# Altium PCB ELF 2 & ELF 2_Lite V1.3.PcbDoc (part 1 of 8)
Units mm, origin at the board's own origin, x right, y up, seen from the top; angles counter-clockwise.
Board outline 120 x 75 mm, 4 copper layers (01 TOP, 02 GND, 03 Signal, 04 BOT), stack 0.603 mm thick; 470 components, 412 nets, 2075 pads, 1565 vias.
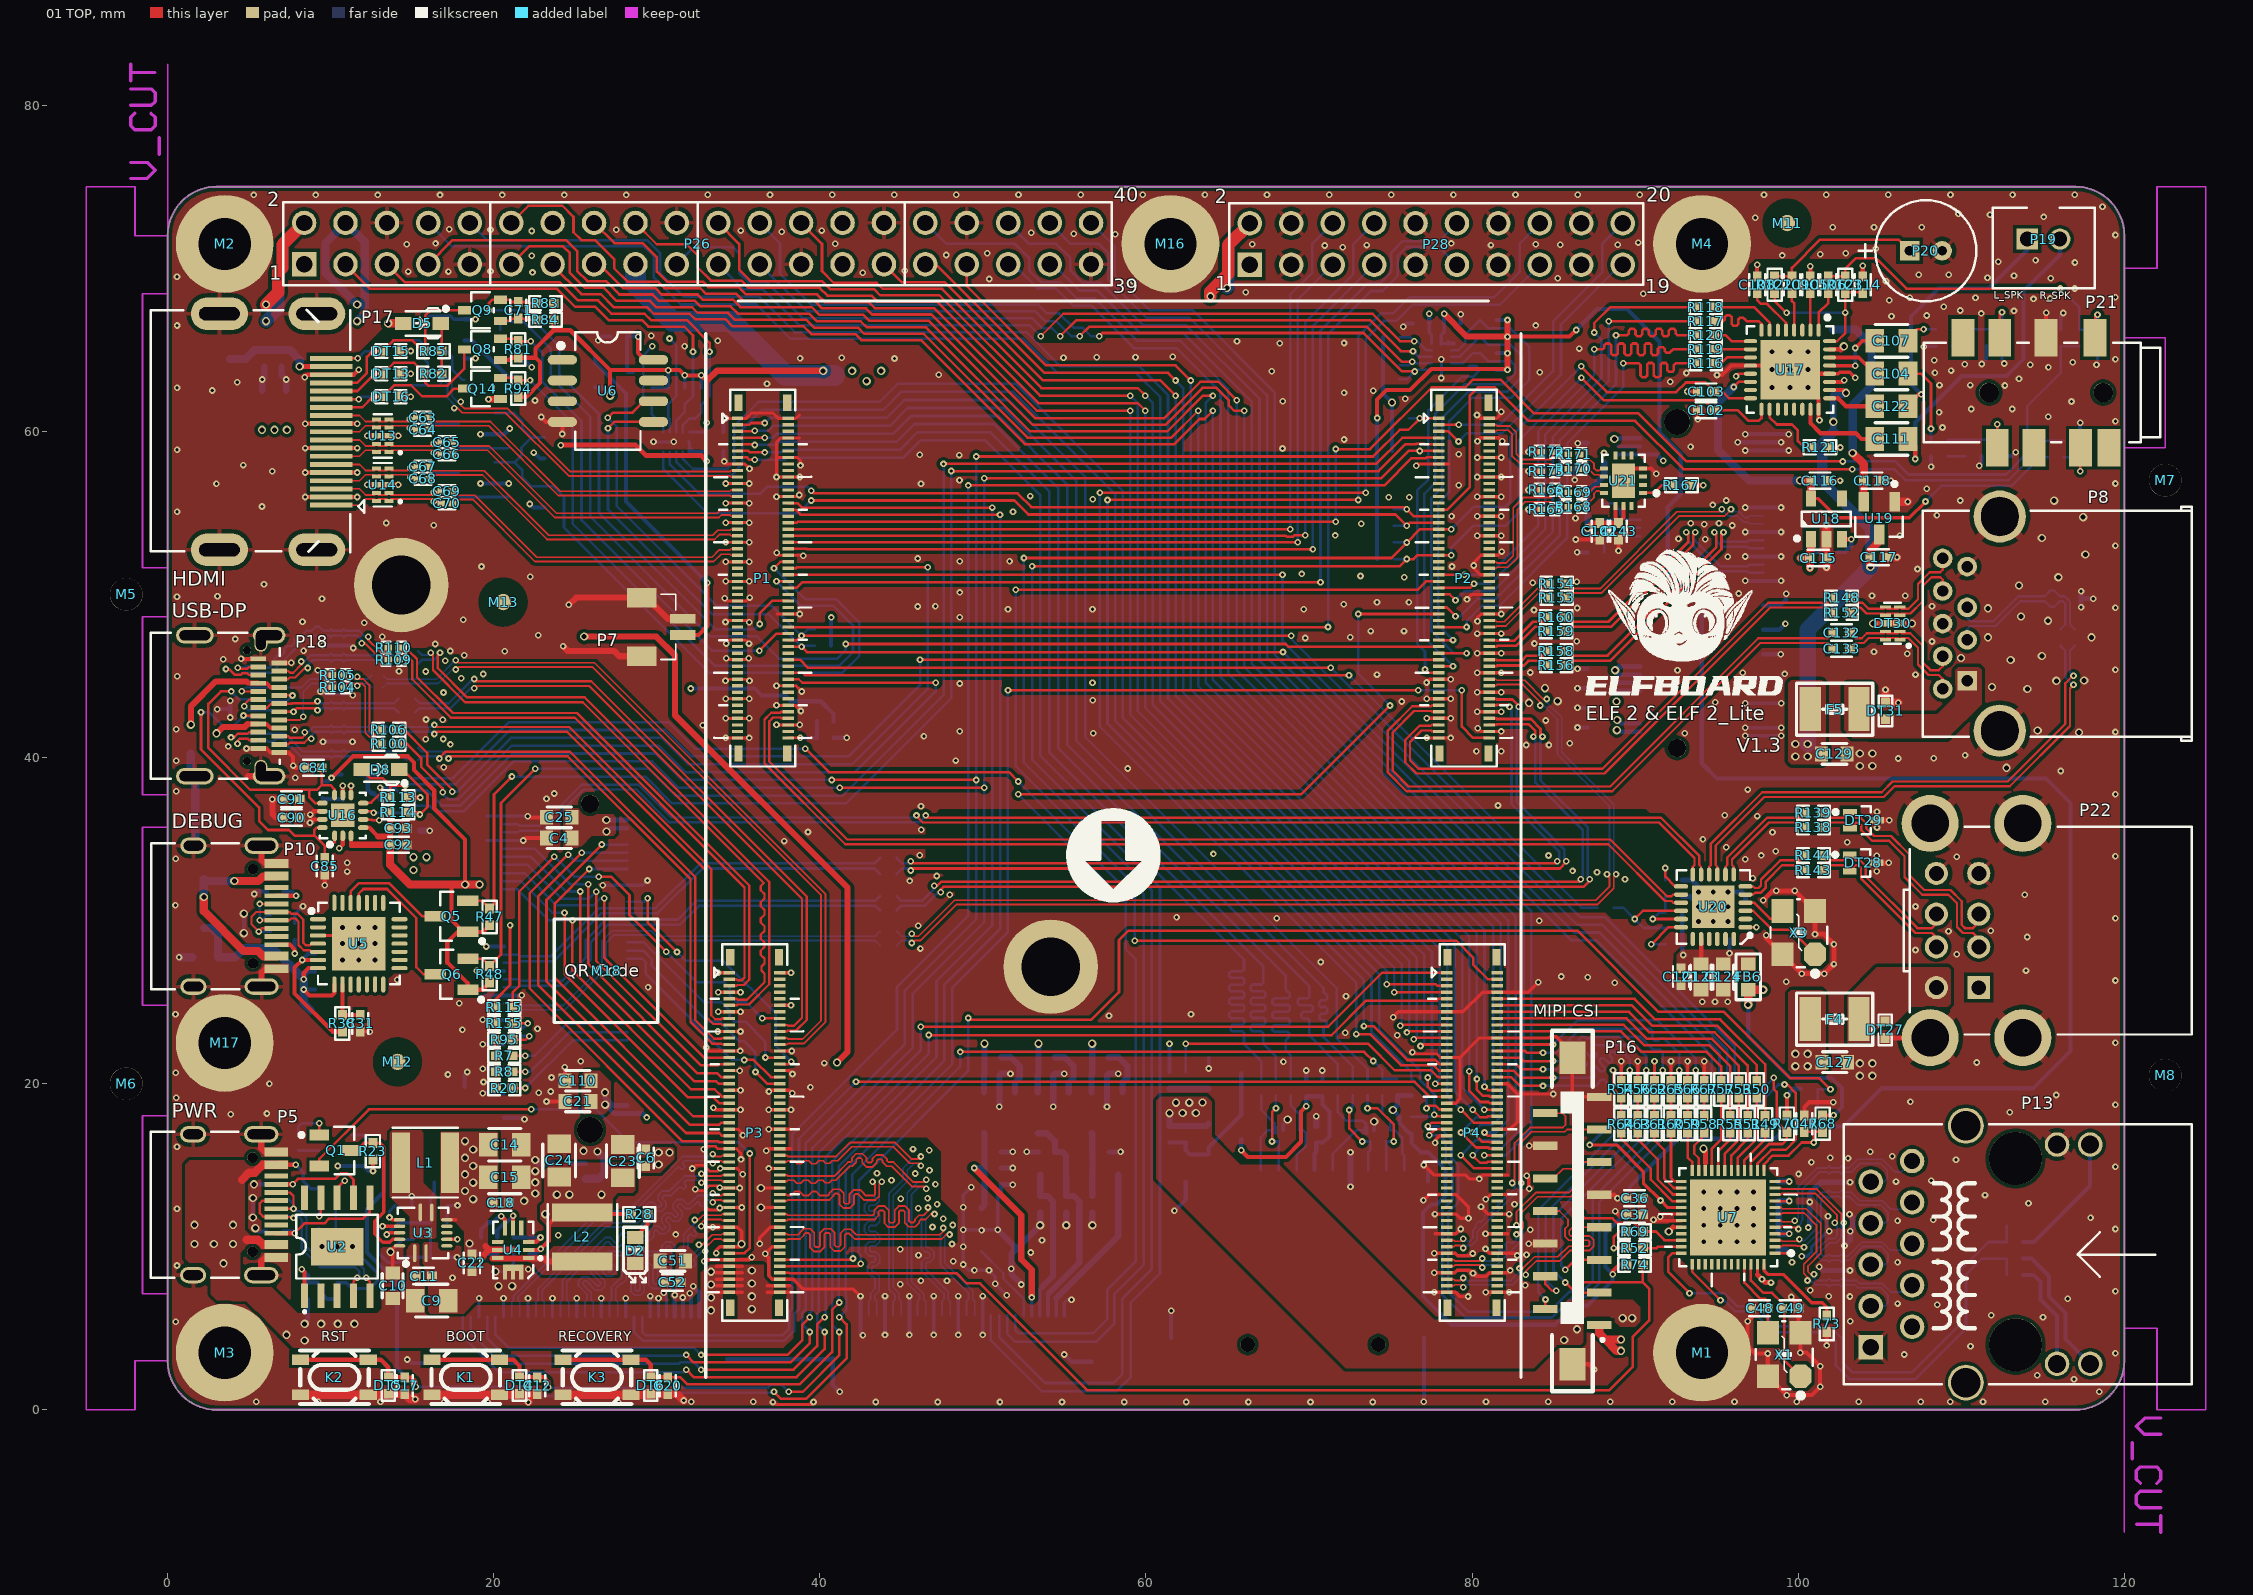
[diagram p0: 01 TOP view]
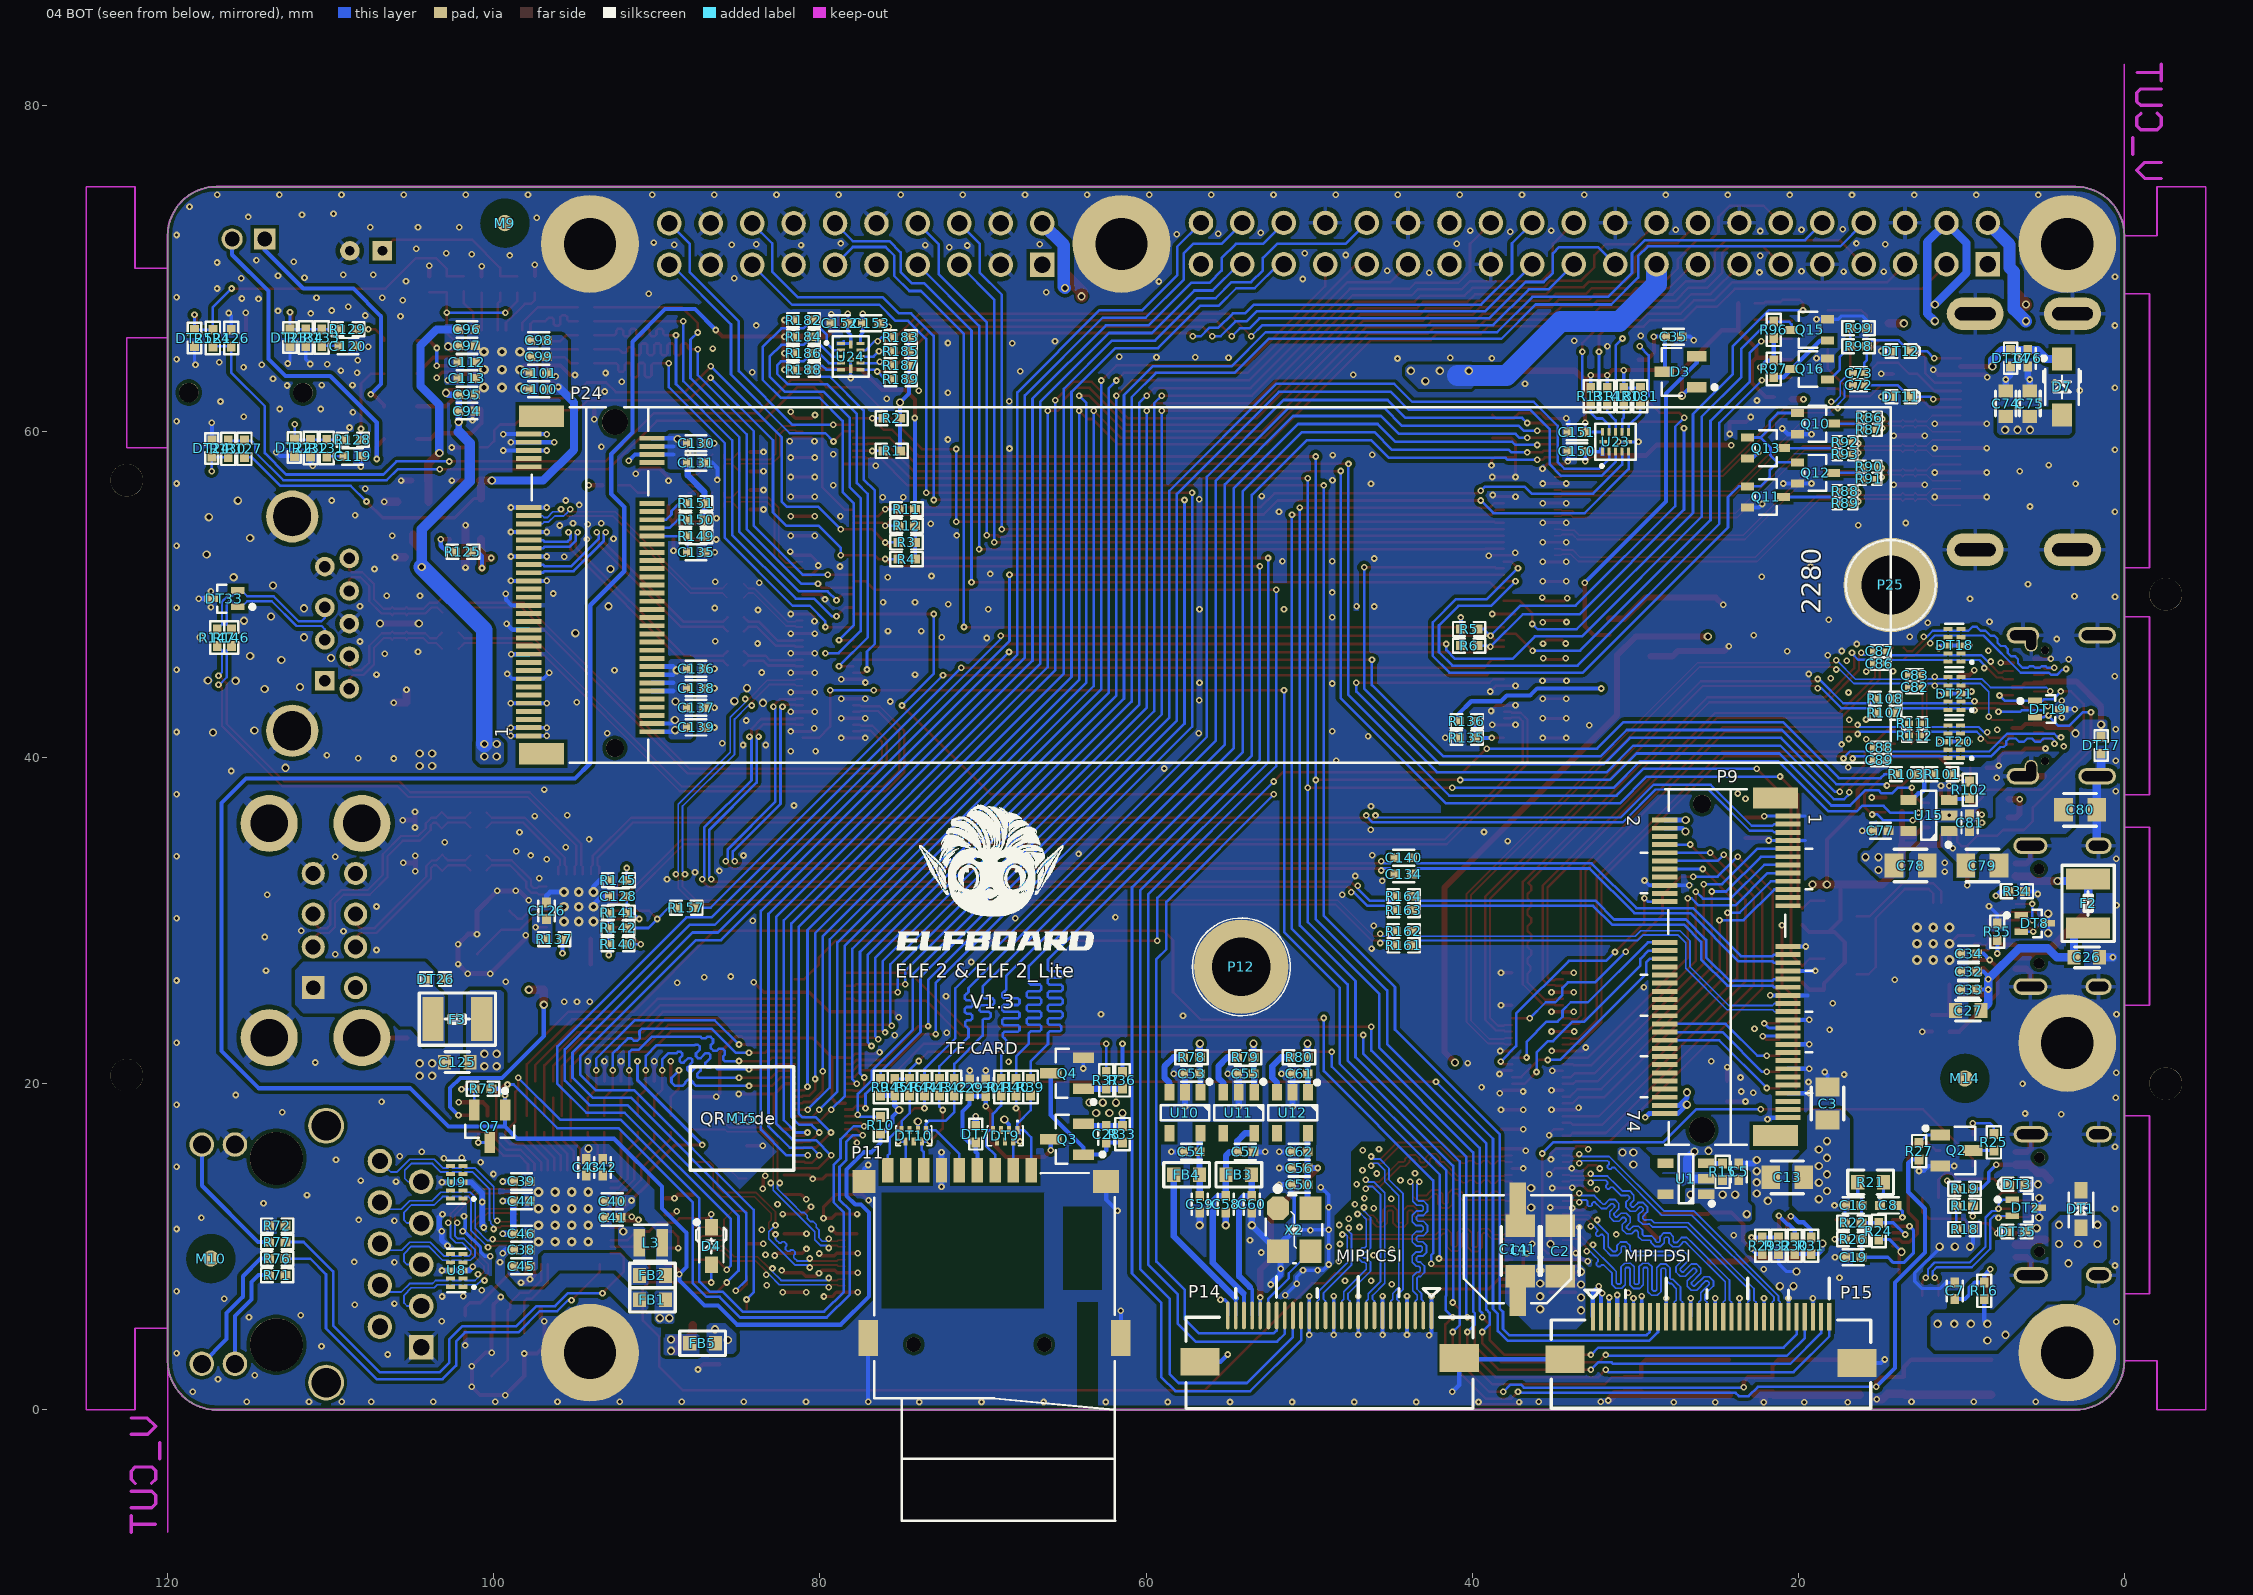
[diagram p1: 04 BOT view, seen from below]
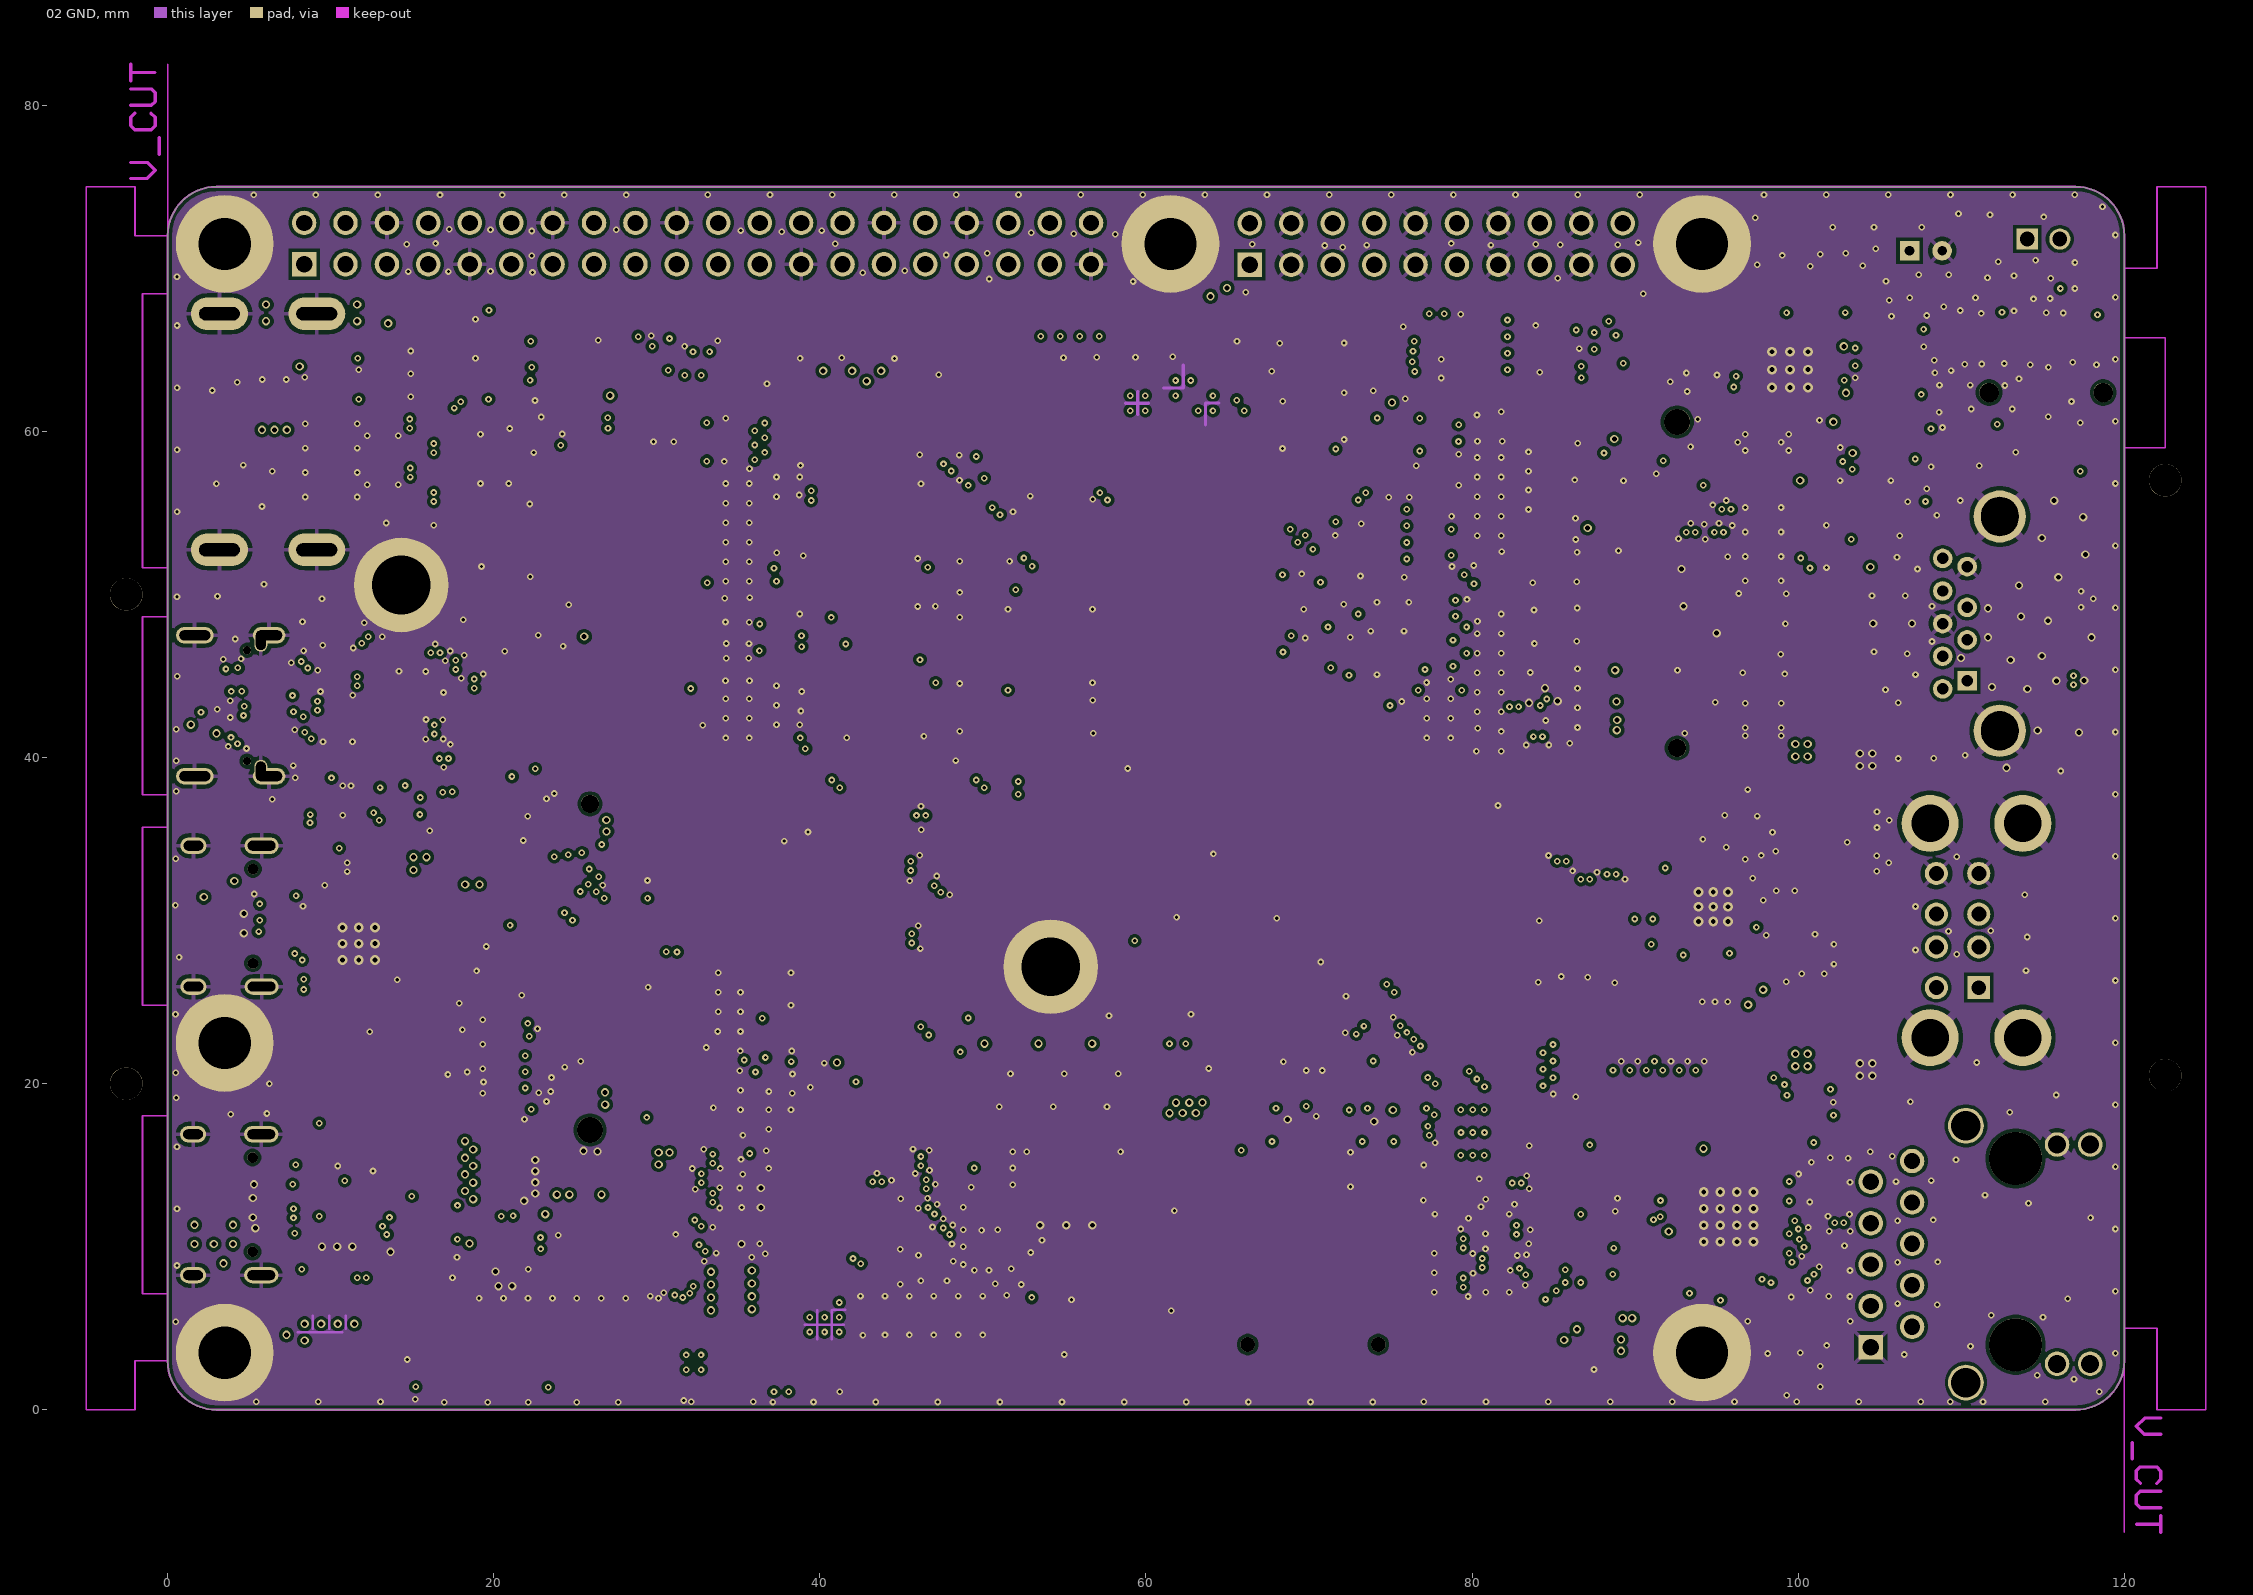
[diagram p2: 02 GND]
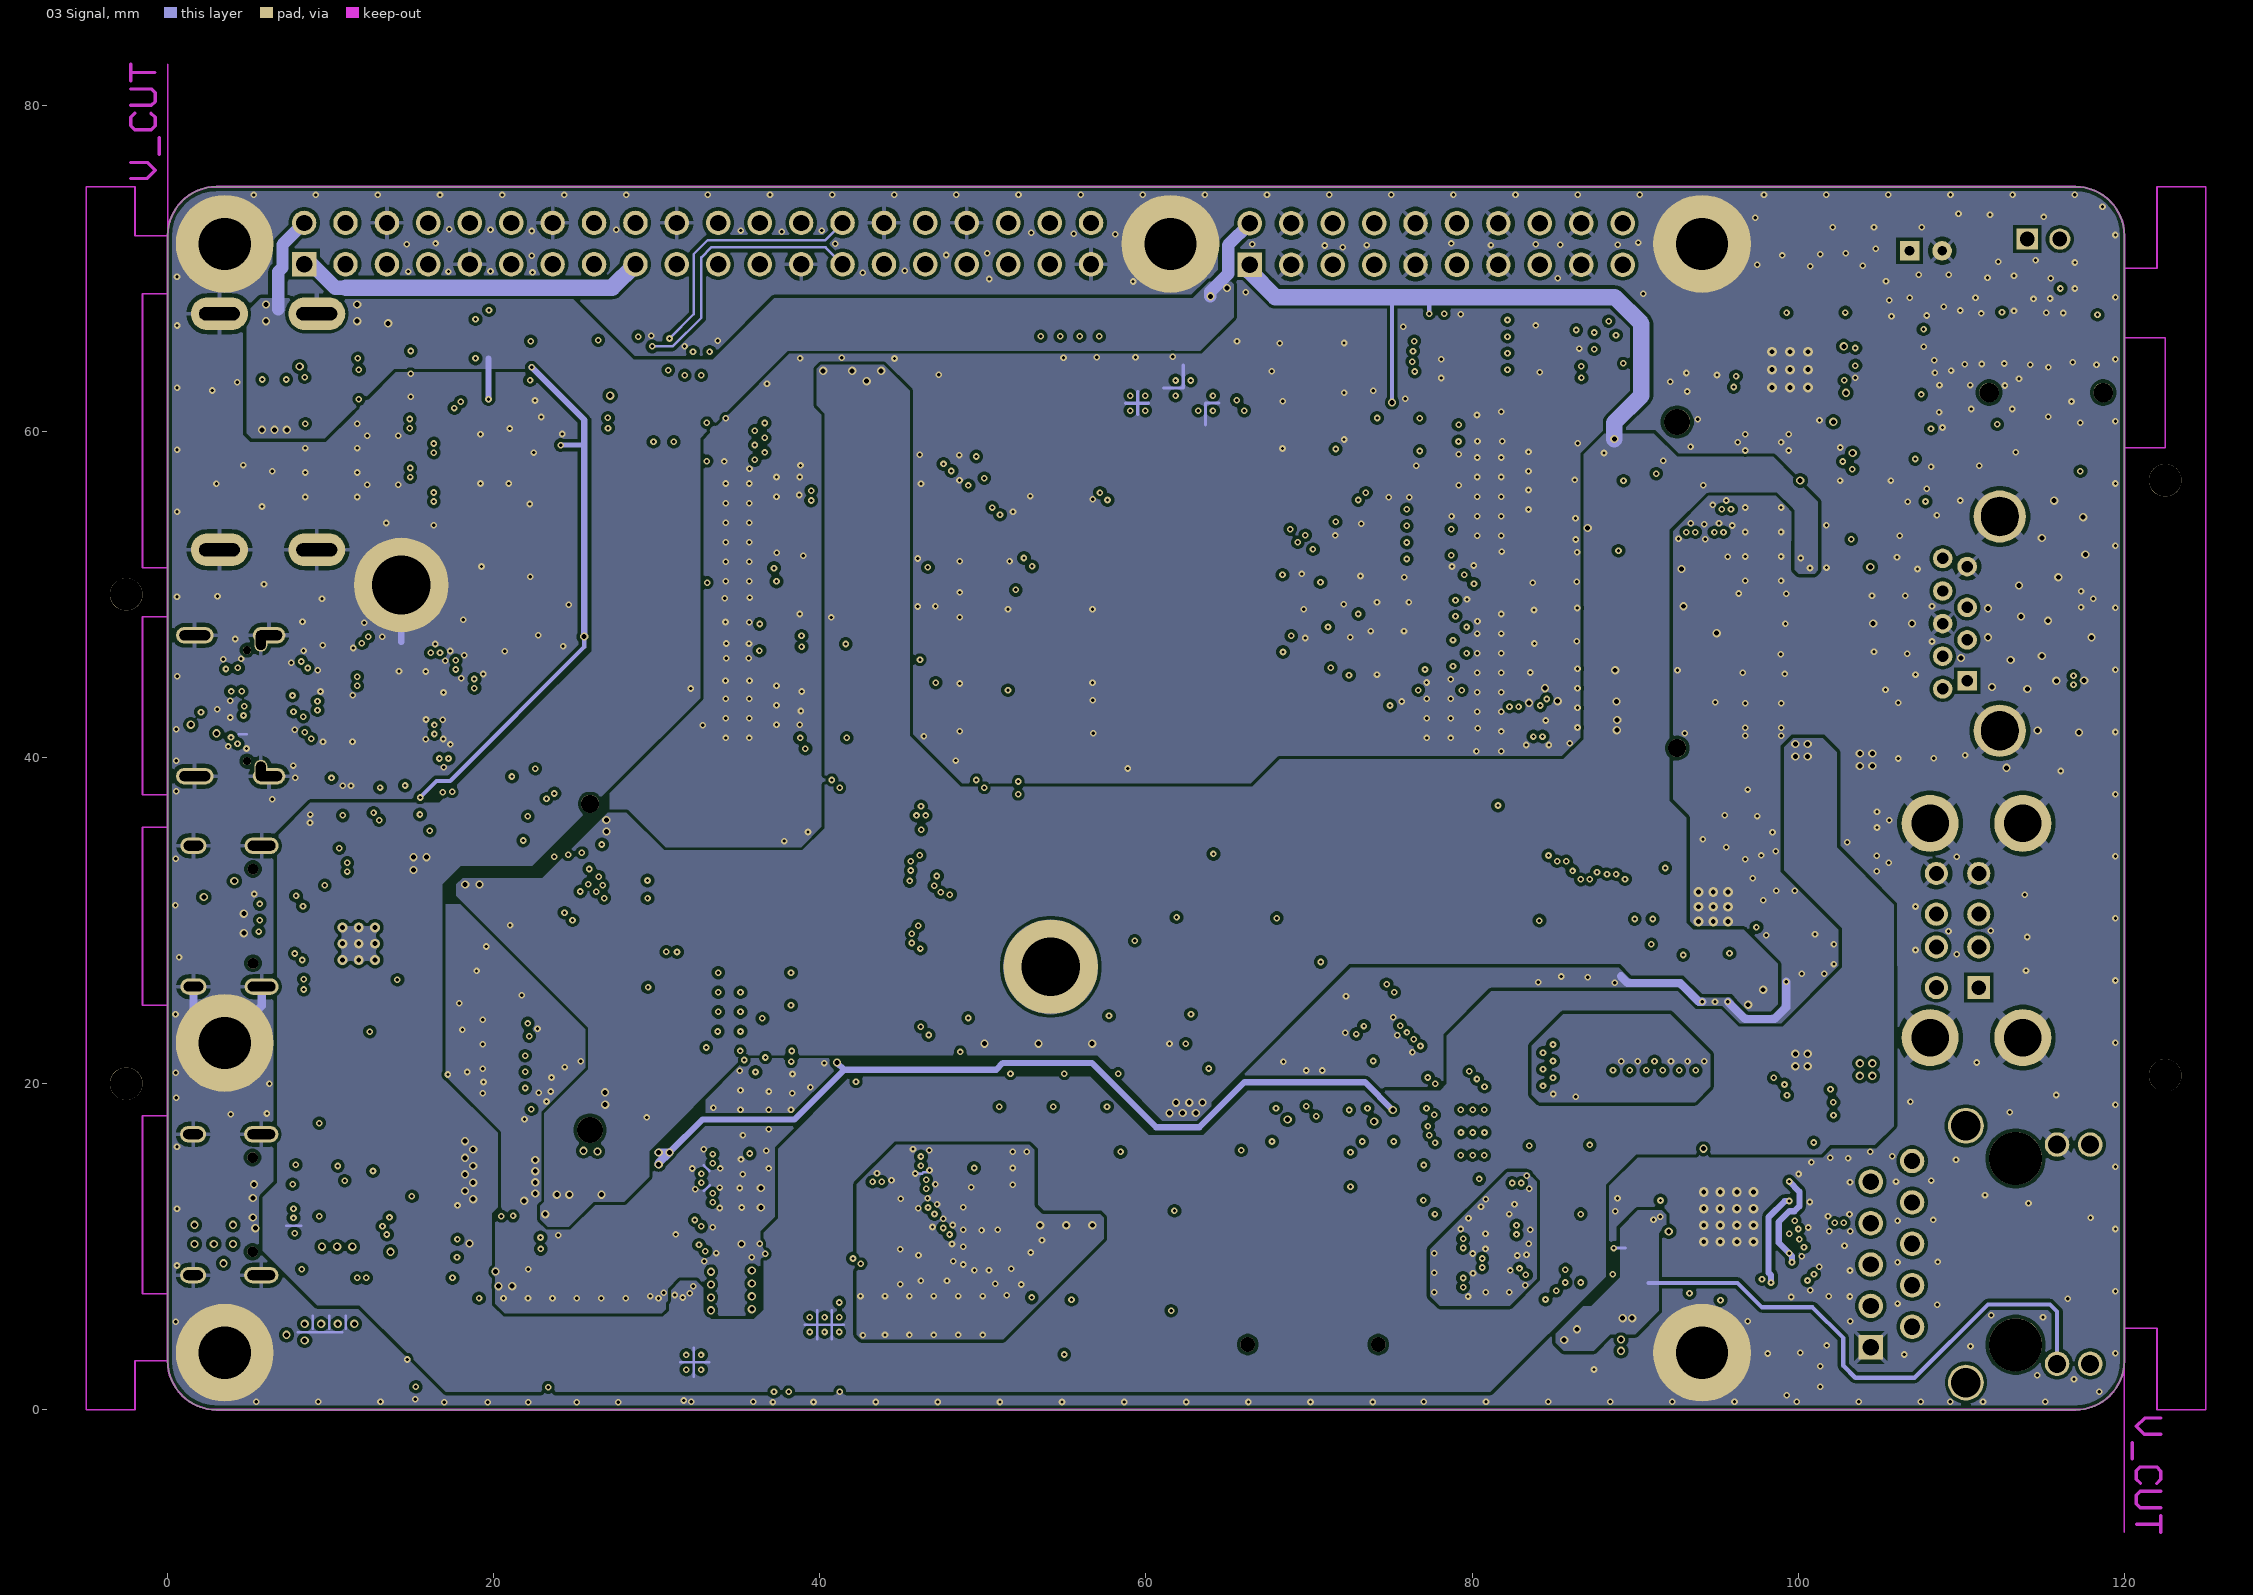
[diagram p3: 03 Signal]
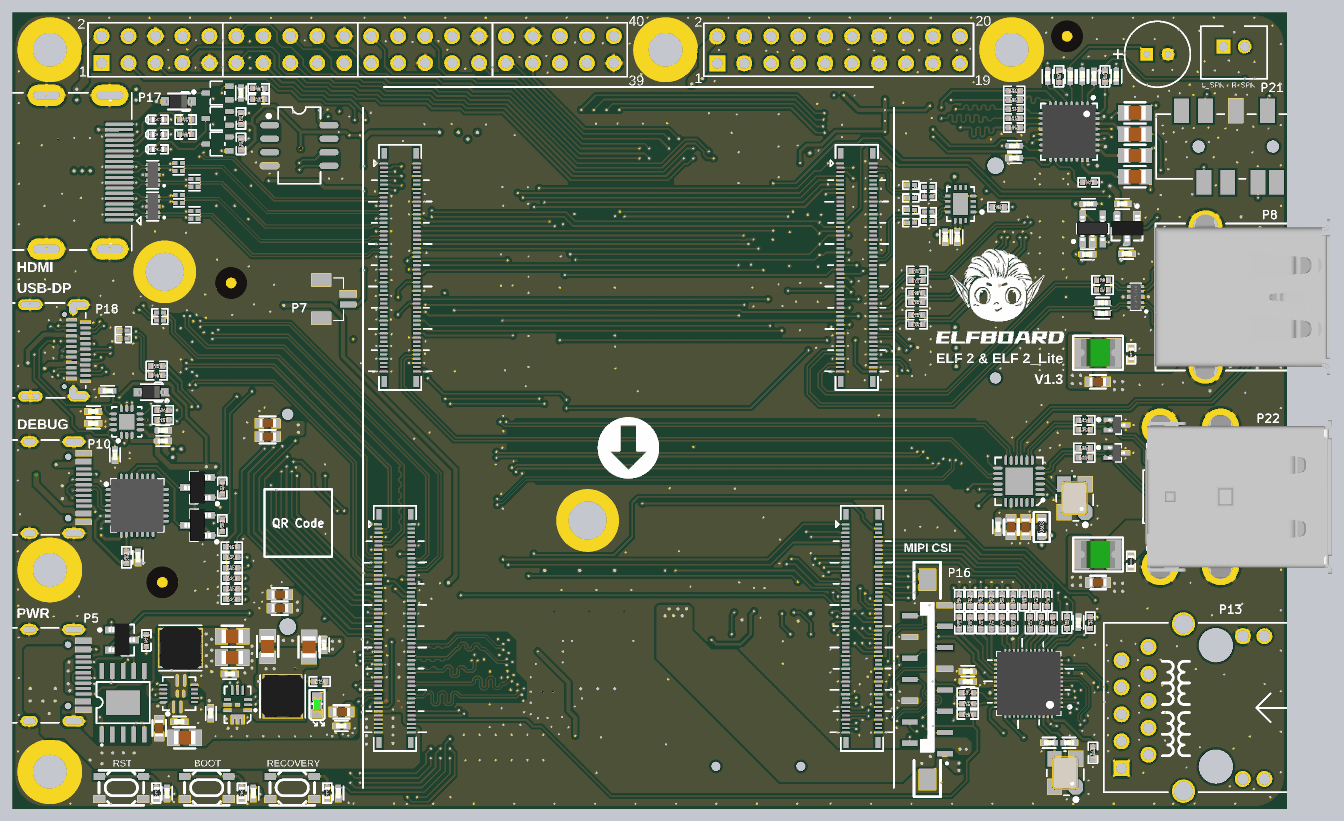
[diagram p10: 3D render of the assembled board from above, using the file's embedded part models]
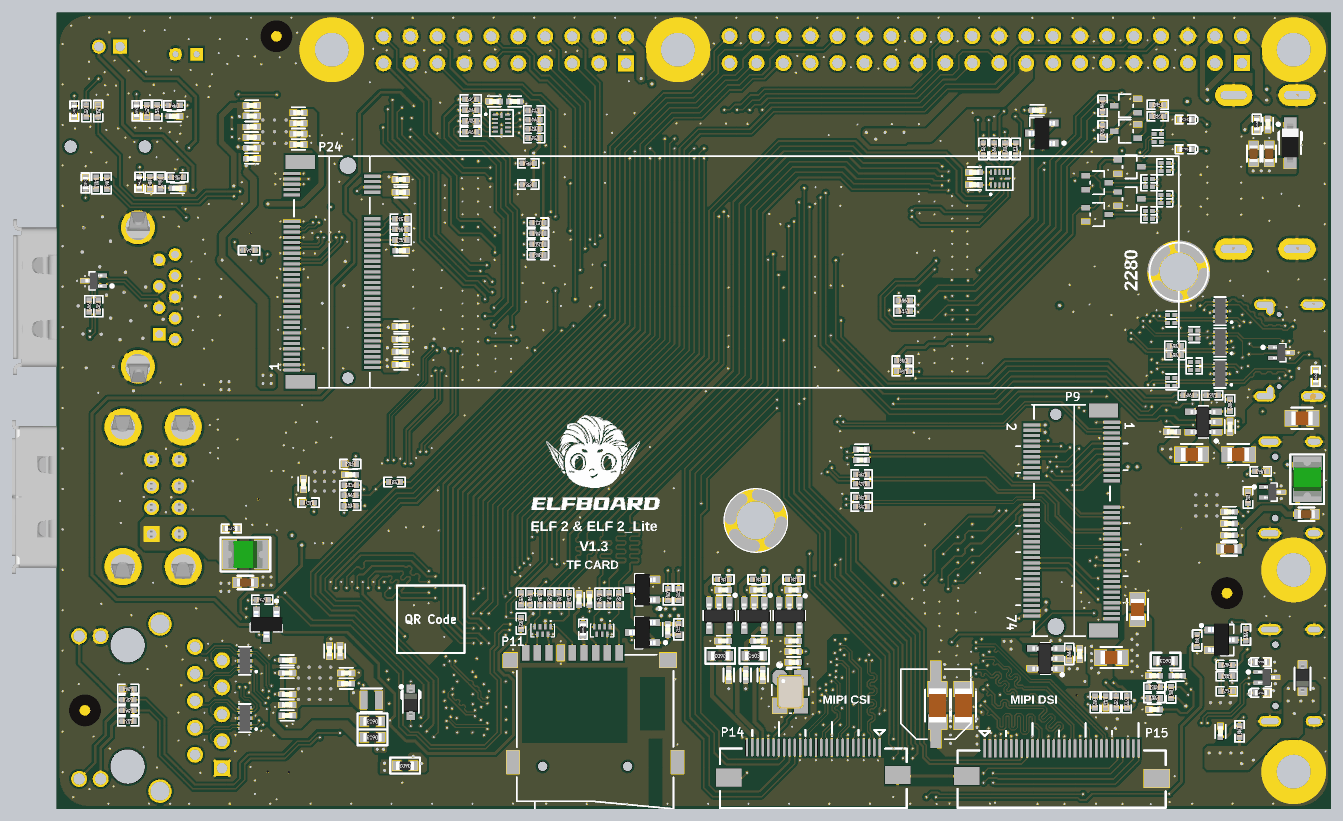
[diagram p11: 3D render of the assembled board from below, using the file's embedded part models]

## Layer stack, top to bottom
Top Solder: solder mask 0.0102, Solder Resist, Dk 3.5
01 TOP: signal copper 0.0356
Dielectric 2: prepreg 0.0711, PP-006, Dk 4.1
02 GND: signal copper 0.035
Dielectric 1: dielectric 0.32, FR-4, Dk 4.8
03 Signal: signal copper 0.035
Dielectric 3: prepreg 0.0711, PP-006, Dk 4.1
04 BOT: signal copper 0.0356
Bottom Solder: solder mask 0.0102, Solder Resist, Dk 3.5

## Board outline
0,3 0,72 cw(c3,72) 3,75 117,75 cw(c117,72) 120,72 120,3 cw(c117,3) 117,0 3,0 cw(c3,3)

## Design rules (kind name [scope] priority, off if disabled: settings)
AcuteAngle [All] p1: minimum=6.00000000000000E+0001 checktracksonly=FALSE
Clearance [All] p1: gap=0.152 ignorepadtopadclearanceinfootprint=TRUE except(0.203: Arc-Fill Arc-Poly Arc-Region Track-Fill Track-Poly Track-Region SMDPad-Fill SMDPad-Poly SMDPad-Region THPad-Fill THPad-Poly THPad-Region Via-Fill Via-Poly Via-Region Fill-Fill Fill-Poly Fill-Region Poly-Poly Poly-Region Region-Region)
ComponentClearance [All] p1: gap=0 collisioncheckmode=3 verticalgap=0 showdistances=FALSE
DiffPairsRouting "85 ohm" [InDifferentialPairClass('85 ohm')] p1: maxlimit=0.152 minlimit=0.152 mostfreqgap=0.152 toplayer_minwidth=0.163 toplayer_maxwidth=0.163 toplayer_prefwidth=0.163 midlayer1_minwidth=0.163 midlayer1_maxwidth=0.163 midlayer1_prefwidth=0.163 midlayer4_minwidth=0.163 midlayer4_maxwidth=0.163 midlayer4_prefwidth=0.163 bottomlayer_minwidth=0.163 bottomlayer_maxwidth=0.163 bottomlayer_prefwidth=0.163 maxuncoupledlength=12.7
DiffPairsRouting "90 ohm" [InDifferentialPairClass('90 ohm')] p2: maxlimit=0.152 minlimit=0.152 mostfreqgap=0.152 toplayer_minwidth=0.142 toplayer_maxwidth=0.142 toplayer_prefwidth=0.142 midlayer1_minwidth=0.142 midlayer1_maxwidth=0.142 midlayer1_prefwidth=0.142 midlayer4_minwidth=0.142 midlayer4_maxwidth=0.142 midlayer4_prefwidth=0.142 bottomlayer_minwidth=0.142 bottomlayer_maxwidth=0.142 bottomlayer_prefwidth=0.142 maxuncoupledlength=40.64
DiffPairsRouting "100 ohm" [InDifferentialPairClass('100 ohm')] p3: maxlimit=0.152 minlimit=0.152 mostfreqgap=0.152 toplayer_minwidth=0.109 toplayer_maxwidth=0.109 toplayer_prefwidth=0.109 midlayer1_minwidth=0.109 midlayer1_maxwidth=0.109 midlayer1_prefwidth=0.109 midlayer4_minwidth=0.109 midlayer4_maxwidth=0.109 midlayer4_prefwidth=0.109 bottomlayer_minwidth=0.109 bottomlayer_maxwidth=0.109 bottomlayer_prefwidth=0.109 maxuncoupledlength=25.4
HoleSize [All] p1: absolutevalues=TRUE maxlimit=2539.975 minlimit=0.025 maxpercent=80.000 minpercent=20.000
Length [All] p1: maxlimit=2540 minlimit=0
MatchedLengths xsignal-I2S [InxSignalClass('Audio')] p1: tolerance=0.127 checknetsindiffpair=FALSE checkdiffpairvsdiffpair=TRUE checkxsignals=TRUE checkothers=TRUE
MatchedLengths xsignal-SDIO [InxSignalClass('SDIO')] p2: tolerance=0.127 checknetsindiffpair=FALSE checkdiffpairvsdiffpair=TRUE checkxsignals=TRUE checkothers=TRUE
MatchedLengths xsignal-RGMII_TX [InxSignalClass('RGMII_TX')] p3: tolerance=3.302 checknetsindiffpair=FALSE checkdiffpairvsdiffpair=TRUE checkxsignals=TRUE checkothers=TRUE
MatchedLengths xsignal-RGMII_RX [InxSignalClass('RGMII_RX')] p4: tolerance=3.048 checknetsindiffpair=FALSE checkdiffpairvsdiffpair=TRUE checkxsignals=TRUE checkothers=TRUE
MatchedLengths xsignal-HDMI [InxSignalClass('HDMI')] p5: tolerance=0.127 checknetsindiffpair=FALSE checkdiffpairvsdiffpair=TRUE checkxsignals=TRUE checkothers=TRUE
MatchedLengths xsignal-DSI [InxSignalClass('DSI')] p6: tolerance=0.127 checknetsindiffpair=FALSE checkdiffpairvsdiffpair=TRUE checkxsignals=TRUE checkothers=TRUE
MatchedLengths xsignal-CSI2 [InxSignalClass('CSI2')] p7: tolerance=0.127 checknetsindiffpair=FALSE checkdiffpairvsdiffpair=TRUE checkxsignals=TRUE checkothers=TRUE
MatchedLengths xsignal-CSI0 [InxSignalClass('CSI0')] p8: tolerance=0.127 checknetsindiffpair=FALSE checkdiffpairvsdiffpair=TRUE checkxsignals=TRUE checkothers=TRUE
MinimumSolderMaskSliver [All] p1: minsoldermaskwidth=0
PlaneClearance [All] p1: clearance=0.254
PlaneConnect [All] p1: planeconnectstyle=Direct reliefexpansion=0.508 reliefentries=4 reliefconductorwidth=0.508 reliefairgap=0.254
PolygonConnect [All] p1: thpad.connectstyle=Relief thpad.reliefconductorwidth=0.508 thpad.reliefentries=4 thpad.polygonreliefangle="45 Angle" thpad.airgapwidth=0.254 smdpad.connectstyle=Direct smdpad.reliefconductorwidth=0.508 smdpad.reliefentries=4 smdpad.polygonreliefangle="45 Angle" smdpad.airgapwidth=0.254 via.connectstyle=Direct via.reliefconductorwidth=0.508 via.reliefentries=4 via.polygonreliefangle="45 Angle" via.airgapwidth=0.254
RoutingCorners [All] p1: cornerstyle=45-Degree minsetback=1.27 maxsetback=2.54
RoutingVias [All] p1: holewidth=0.203 width=0.406 viastyle="Through Hole" minholewidth=0.203 minwidth=0.406 maxholewidth=406.4 maxwidth=1574.8
SilkToSilkClearance [All] p1: silktosilkclearance=0
SilkToSolderMaskClearance [IsPad] p1: minsilkscreentomaskgap=0 clearancetoexposedcopper=TRUE
SolderMaskExpansion [All] p1: expansion=0.102 istentingtop=TRUE useseparateexpansions=TRUE expansionbottom=0.102 istentingbottom=TRUE
UnRoutedNet [All] p1: checkbadconnections=TRUE
Width [All] p1: maxlimit=5.08 minlimit=0.156 preferedwidth=0.156
20 further rules are at their usual default settings.

## Classes and differential pairs
differential pair class "90 ohm": DEBUG_D TYPEC0_OTG TYPEC0_RX1 TYPEC0_RX2 TYPEC0_TX1 TYPEC0_TX2 USB USB2_D1 USB2_D2 USB2_D3 USB2_D4 USB2_HOST1_D USB2_OTG0_D USB3_HOST1_SSRX USB3_HOST1_SSTX USB3_OTG0_SSRX1 USB3_OTG0_SSRX2 USB3_OTG0_SSTX1 USB3_OTG0_SSTX2 USB3_SSRX_R USB3_SSTX_T USB_D1 USB_D2 USB_D3 USB_D4
differential pair class "85 ohm": PCIE0_RX PCIE0_TX PCIE2_RX PCIE2_TX PCIE20_0_RX PCIE20_0_TX S_PCIE_RX S_PCIE_TX
component class "11 WIFI&BT&GPIO": C4 C21 C25 C110 C134 C140 C142 C143 C150 C151 C152 C153 P9 P12 P26 P28 R7 R8 R13 R14 R20 R95 R155 R161 R162 R163 R164 R165 R166 R167 R168 R169 R170 R171 R172 R173 R180 R181 R182 R183 R184 R185 R186 R187 R188 R189 U21 U23 U24
component class "10 USB2.0 HUB&PCIe": C121 C123 C124 C125 C126 C127 C128 C129 C130 C131 C132 C133 C135 C136 C137 C138 C139 DT26 DT27 DT28 DT29 DT30 DT31 DT33 F3 F4 F5 FB6 P8 P22 P24 P25 R135 R136 R137 R138 R139 R140 R141 R142 R143 R144 R145 R146 R147 R148 R149 R150 R151 R152 R153 R154 R156 R157 R158 R159 R160 U20 X3
component class "08 TypeC USB DP": C77 C78 C79 C80 C81 C82 C83 C84 C85 C86 C87 C88 C89 C90 C91 C92 C93 D8 DT17 DT18 DT19 DT20 DT21 P18 R100 R101 R102 R103 R104 R105 R106 R107 R108 R109 R110 R111 R112 R113 R114 R115 U15 U16
component class "07 HDMI": C63 C64 C65 C66 C67 C68 C69 C70 C71 C72 C73 C74 C75 C76 D5 D7 DT11 DT12 DT13 DT14 DT15 DT16 P17 Q8 Q9 Q10 Q11 Q12 Q13 Q14 Q15 Q16 R81 R82 R83 R84 R85 R86 R87 R88 R89 R90 R91 R92 R93 R94 R96 R97 R98 R99 U13 U14
component class "06 MIPI": C50 C51 C52 C53 C54 C55 C56 C57 C58 C59 C60 C61 C62 FB3 FB4 FB5 P14 P15 P16 R78 R79 R80 U10 U11 U12 X2
component class "04 Debug&TF card&RTC": C26 C27 C28 C29 C30 C31 C32 C33 C34 C35 D3 DT7 DT8 DT9 DT10 F2 P7 P10 P11 Q3 Q4 Q5 Q6 R33 R34 R35 R36 R37 R38 R39 R40 R41 R42 R43 R44 R45 R46 R47 R48 U5 U6
component class "09 Audio": C94 C95 C96 C97 C98 C99 C100 C101 C102 C103 C104 C105 C106 C107 C108 C109 C111 C112 C113 C114 C115 C116 C117 C118 C119 C120 C122 DT22 DT23 DT24 DT25 P19 P20 P21 R116 R117 R118 R119 R120 R121 R122 R123 R124 R125 R126 R127 R128 R129 R130 R131 R132 R133 R134 U17 U18 U19
component class "05 Ethernet": C36 C37 C38 C39 C40 C41 C42 C43 C44 C45 C46 C47 C48 C49 D4 FB1 FB2 L3 P13 Q7 R49 R50 R51 R52 R53 R54 R55 R56 R57 R58 R59 R60 R61 R62 R63 R64 R65 R66 R67 R68 R69 R70 R71 R72 R73 R74 R75 R76 R77 U7 U8 U9 X1
component class "03 PWR": C3 C5 C6 C7 C8 C9 C10 C11 C12 C13 C14 C15 C16 C17 C18 C19 C20 C22 C23 C24 D2 DT1 DT2 DT3 DT4 DT5 DT6 DT35 K1 K2 K3 L1 L2 M1 M2 M3 M4 M5 M6 M7 M8 M9 M10 M11 M12 M13 M14 M15 M16 M17 P5 Q1 Q2 R15 R16 R17 R18 R19 R21 R22 R23 R24 R25 R26 R27 R28 R29 R30 R31 R32 U1 U2 U3 U4
component class "02 Connector": C1 C2 C141 P1 P2 P3 P4 R1 R2 R3 R4 R5 R6 R9 R10 R11 R12
differential pair class "100 ohm": DP_TX_AUX ETH0_TRX0 ETH0_TRX1 ETH0_TRX2 ETH0_TRX3 HDMI_TX0 HDMI_TX1 HDMI_TX2 HDMI_TX3 HDMI_TX_D0 HDMI_TX_D1 HDMI_TX_D2 HDMI_TX_D3 HDMI_TX_SBD MIPI_DPHY_CSI0_RX_CLK MIPI_DPHY_CSI0_RX_D0 MIPI_DPHY_CSI0_RX_D1 MIPI_DPHY_CSI0_RX_D2 MIPI_DPHY_CSI0_RX_D3 MIPI_DPHY_CSI2_RX_CLK MIPI_DPHY_CSI2_RX_D0 MIPI_DPHY_CSI2_RX_D1 MIPI_DPHY_DSI_TX_CLK MIPI_DPHY_DSI_TX_D0 MIPI_DPHY_DSI_TX_D1 MIPI_DPHY_DSI_TX_D2 MIPI_DPHY_DSI_TX_D3 PCIE0_REFCLK PCIE2_CLK PCIE20_0_REFCLK PCIE30_PORT0_REFCLK_IN PCIE30_PORT1_REFCLK_IN PCIE_CLK0 PCIE_CLK1 S_PCIE_CLK TYPEC0_AUX
differential pair PCIE_CLK1: +PCIE_CLK1_P -PCIE_CLK1_N
differential pair PCIE2_TX: +PCIE2_TX_P -PCIE2_TX_N
differential pair PCIE2_RX: +PCIE2_RX_P -PCIE2_RX_N
differential pair PCIE2_CLK: +PCIE2_CLK_P -PCIE2_CLK_N
differential pair PCIE_CLK0: +PCIE_CLK0_P -PCIE_CLK0_N
differential pair PCIE30_PORT1_REFCLK_IN: +PCIE30_PORT1_REFCLK_IN_P -PCIE30_PORT1_REFCLK_IN_N
differential pair PCIE30_PORT0_REFCLK_IN: +PCIE30_PORT0_REFCLK_IN_P -PCIE30_PORT0_REFCLK_IN_N
differential pair PCIE20_0_TX: +PCIE20_0_TX_P -PCIE20_0_TX_N
differential pair PCIE20_0_RX: +PCIE20_0_RX_P -PCIE20_0_RX_N
differential pair PCIE20_0_REFCLK: +PCIE20_0_REFCLK_P -PCIE20_0_REFCLK_N
differential pair USB: +USB_P -USB_N
differential pair USB_D4: +USB_D4_P -USB_D4_N
differential pair USB_D3: +USB_D3_P -USB_D3_N
differential pair USB_D2: +USB_D2_P -USB_D2_N
differential pair USB_D1: +USB_D1_P -USB_D1_N
differential pair USB2_D4: +USB2_D4_P -USB2_D4_N
differential pair USB2_D3: +USB2_D3_P -USB2_D3_N
differential pair USB2_D2: +USB2_D2_P -USB2_D2_N
differential pair S_PCIE_TX: +S_PCIE_TX_P -S_PCIE_TX_N
differential pair S_PCIE_RX: +S_PCIE_RX_P -S_PCIE_RX_N
differential pair DEBUG_D: +DEBUG_D_P -DEBUG_D_N
differential pair USB3_SSTX_T: +USB3_SSTX_T_P -USB3_SSTX_T_N
differential pair USB3_SSRX_R: +USB3_SSRX_R_P -USB3_SSRX_R_N
differential pair USB3_OTG0_SSTX2: +USB3_OTG0_SSTX2_P -USB3_OTG0_SSTX2_N
differential pair USB3_OTG0_SSTX1: +USB3_OTG0_SSTX1_P -USB3_OTG0_SSTX1_N
differential pair USB3_OTG0_SSRX2: +USB3_OTG0_SSRX2_P -USB3_OTG0_SSRX2_N
differential pair USB3_OTG0_SSRX1: +USB3_OTG0_SSRX1_P -USB3_OTG0_SSRX1_N
differential pair USB3_HOST1_SSTX: +USB3_HOST1_SSTX_P -USB3_HOST1_SSTX_N
differential pair USB3_HOST1_SSRX: +USB3_HOST1_SSRX_P -USB3_HOST1_SSRX_N
differential pair USB2_OTG0_D: +USB2_OTG0_D_P -USB2_OTG0_D_N
differential pair USB2_HOST1_D: +USB2_HOST1_D_P -USB2_HOST1_D_N
differential pair TYPEC0_TX2: +TYPEC0_TX2_P -TYPEC0_TX2_N
differential pair TYPEC0_TX1: +TYPEC0_TX1_P -TYPEC0_TX1_N
differential pair TYPEC0_RX2: +TYPEC0_RX2_P -TYPEC0_RX2_N
differential pair TYPEC0_RX1: +TYPEC0_RX1_P -TYPEC0_RX1_N
differential pair TYPEC0_OTG: +TYPEC0_OTG_P -TYPEC0_OTG_N
differential pair TYPEC0_AUX: +TYPEC0_AUX_P -TYPEC0_AUX_N
differential pair S_PCIE_CLK: +S_PCIE_CLK_P -S_PCIE_CLK_N
differential pair PCIE0_TX: +PCIE0_TX_P -PCIE0_TX_N
differential pair PCIE0_RX: +PCIE0_RX_P -PCIE0_RX_N
differential pair PCIE0_REFCLK: +PCIE0_REFCLK_P -PCIE0_REFCLK_N
differential pair MIPI_DPHY_DSI_TX_D3: +MIPI_DPHY_DSI_TX_D3_P -MIPI_DPHY_DSI_TX_D3_N
differential pair MIPI_DPHY_DSI_TX_D2: +MIPI_DPHY_DSI_TX_D2_P -MIPI_DPHY_DSI_TX_D2_N
differential pair MIPI_DPHY_DSI_TX_D1: +MIPI_DPHY_DSI_TX_D1_P -MIPI_DPHY_DSI_TX_D1_N
differential pair MIPI_DPHY_DSI_TX_D0: +MIPI_DPHY_DSI_TX_D0_P -MIPI_DPHY_DSI_TX_D0_N
differential pair MIPI_DPHY_DSI_TX_CLK: +MIPI_DPHY_DSI_TX_CLK_P -MIPI_DPHY_DSI_TX_CLK_N
differential pair MIPI_DPHY_CSI2_RX_D1: +MIPI_DPHY_CSI2_RX_D1_P -MIPI_DPHY_CSI2_RX_D1_N
differential pair MIPI_DPHY_CSI2_RX_D0: +MIPI_DPHY_CSI2_RX_D0_P -MIPI_DPHY_CSI2_RX_D0_N
differential pair MIPI_DPHY_CSI2_RX_CLK: +MIPI_DPHY_CSI2_RX_CLK_P -MIPI_DPHY_CSI2_RX_CLK_N
differential pair MIPI_DPHY_CSI0_RX_D3: +MIPI_DPHY_CSI0_RX_D3_P -MIPI_DPHY_CSI0_RX_D3_N
differential pair MIPI_DPHY_CSI0_RX_D2: +MIPI_DPHY_CSI0_RX_D2_P -MIPI_DPHY_CSI0_RX_D2_N
differential pair MIPI_DPHY_CSI0_RX_D1: +MIPI_DPHY_CSI0_RX_D1_P -MIPI_DPHY_CSI0_RX_D1_N
differential pair MIPI_DPHY_CSI0_RX_D0: +MIPI_DPHY_CSI0_RX_D0_P -MIPI_DPHY_CSI0_RX_D0_N
differential pair MIPI_DPHY_CSI0_RX_CLK: +MIPI_DPHY_CSI0_RX_CLK_P -MIPI_DPHY_CSI0_RX_CLK_N
differential pair HDMI_TX_SBD: +HDMI_TX_SBD_P -HDMI_TX_SBD_N
differential pair HDMI_TX_D3: +HDMI_TX_D3_P -HDMI_TX_D3_N
differential pair HDMI_TX_D2: +HDMI_TX_D2_P -HDMI_TX_D2_N
differential pair HDMI_TX_D1: +HDMI_TX_D1_P -HDMI_TX_D1_N
differential pair HDMI_TX_D0: +HDMI_TX_D0_P -HDMI_TX_D0_N
differential pair HDMI_TX3: +HDMI_TX3_P -HDMI_TX3_N
differential pair HDMI_TX2: +HDMI_TX2_P -HDMI_TX2_N
differential pair HDMI_TX1: +HDMI_TX1_P -HDMI_TX1_N
differential pair HDMI_TX0: +HDMI_TX0_P -HDMI_TX0_N
differential pair ETH0_TRX3: +ETH0_TRX3_P -ETH0_TRX3_N
differential pair ETH0_TRX2: +ETH0_TRX2_P -ETH0_TRX2_N
differential pair ETH0_TRX1: +ETH0_TRX1_P -ETH0_TRX1_N
differential pair ETH0_TRX0: +ETH0_TRX0_P -ETH0_TRX0_N
differential pair DP_TX_AUX: +DP_TX_AUX_P -DP_TX_AUX_N

## Components (designator, comment, footprint, x,y, rotation, side; value= is the part's Value field where it differs from the comment)
C1 "22uF/25V" 1206C 37.053,9.737 r270 bottom
C2 "22uF/25V" 1206C 34.6,9.735 r270 bottom
C3 "22uF" 0805C 18.207,18.779 r270 bottom
C4 "22uF" 0603C 24.023,35.061 r0 top
C5 "1uF" 0402C 23.642,14.588 r270 bottom
C6 "1uF" 0402C 29.327,15.444 r270 top
C7 "1uF" 0402C 10.4,7.29 r270 bottom
C8 "220nF" 0402C 14.473,12.531 r180 bottom
C9 "22uF" 0805C 16.2,6.689 r180 top
C10 "1uF" 0603C 13.8,7.6 r270 top
C11 "100nF" 0402C 15.7,8.2 r180 top
C12 "100nF" 0402C 22.668,1.472 r90 top
C13 "22uF" 0805C 20.678,14.251 r180 bottom
C14 "22uF" 0805C 20.678,16.251 r180 top
C15 "22uF" 0805C 20.678,14.251 r180 top
C16 "100pF" 0402C 16.632,12.531 r0 bottom
C17 "100nF" 0402C 14.54,1.472 r90 top
C18 "100nF" 0402C 20.442,12.709 r0 top
C19 "1uF" 0402C 16.632,9.356 r180 bottom
C20 "100nF" 0402C 30.669,1.472 r90 top
C21 "22uF" 0603C 25.166,18.906 r0 top
C22 "100nF" 0402C 18.664,9 r90 top
C23 "22uF" 0805C 27.922,15.249 r270 top
C24 "22uF" 0805C 24.013,15.291 r270 top
C25 "22uF" 0603C 24.023,36.331 r0 top
C26 "22uF" 0603C 2.303,27.748 r0 bottom
C27 "22uF" 0603C 9.58,24.48 r180 bottom
C28 "100nF" 0402C 62.441,16.9 r90 bottom
C29 "100nF" 0402C 70.815,19.736 r270 bottom
C30 "1uF" 0402C 69.825,19.736 r270 bottom
C31 "100nF" 0402C 11.808,23.695 r90 top
C32 "100nF" 0402C 9.557,26.872 r180 bottom
C33 "1uF" 0402C 9.557,25.772 r180 bottom
C34 "100nF" 0402C 9.557,27.972 r180 bottom
C35 "100nF" 0402C 27.661,65.811 r180 bottom
C36 "4.7uF" 0402C 89.96,12.971 r0 top
C37 "100nF" 0402C 89.962,11.972 r0 top
C38 "4.7uF" 0402C 98.3,9.8 r0 bottom
C39 "100nF" 0402C 98.3,14 r0 bottom
C40 "4.7uF" 0402C 92.736,12.787 r180 bottom
C41 "100nF" 0402C 92.736,11.787 r180 bottom
C42 "4.7uF" 0402C 93.324,14.863 r90 bottom
C43 "100nF" 0402C 94.324,14.863 r90 bottom
C44 "100nF" 0402C 98.3,12.8 r0 bottom
C45 "100nF" 0402C 98.3,8.8 r0 bottom
C46 "100nF" 0402C 98.3,10.8 r0 bottom
C47 "100nF" 0402C 100.373,17.544 r270 top
C48 "22pF" 0402C 97.626,6.225 r0 top
C49 "22pF" 0402C 99.506,6.225 r180 top
C50 "100nF" 0402C 50.602,13.806 r180 bottom
C51 "10uF" 0603C 30.983,9.127 r0 top
C52 "100nF" 0402C 30.957,7.807 r0 top
C53 "1uF" 0402C 57.209,20.613 r180 bottom
C54 "1uF" 0402C 57.217,15.813 r180 bottom
C55 "1uF" 0402C 53.909,20.613 r180 bottom
C56 "100nF" 0402C 50.602,14.822 r180 bottom
C57 "1uF" 0402C 53.909,15.813 r0 bottom
C58 "100nF" 0402C 55.109,12.605 r90 bottom
C59 "100nF" 0402C 56.709,12.605 r90 bottom
C60 "100nF" 0402C 53.509,12.605 r90 bottom
C61 "1uF" 0402C 50.609,20.613 r180 bottom
C62 "1uF" 0402C 50.609,15.813 r180 bottom
C63 "220nF" 0201C 15.631,60.846 r180 top
C64 "220nF" 0201C 15.631,60.096 r180 top
C65 "220nF" 0201C 17.126,59.346 r180 top
C66 "220nF" 0201C 17.126,58.596 r180 top
C67 "220nF" 0201C 15.656,57.833 r180 top
C68 "220nF" 0201C 15.656,57.083 r180 top
C69 "220nF" 0201C 17.126,56.333 r180 top
C70 "220nF" 0201C 17.126,55.583 r180 top
C71 "100pF" 0402C 21.501,67.426 r270 top
C72 "1uF" 0201C 16.301,62.826 r180 bottom
C73 "1uF" 0201C 16.303,63.572 r180 bottom
C74 "10uF" 0603C 7.276,61.701 r270 bottom
C75 "100nF" 0603C 5.801,61.701 r270 bottom
C76 "1uF" 0402C 5.926,64.476 r90 bottom
C77 "100nF" 0402C 14.965,35.508 r0 bottom
C78 "22uF" 0805C 13.11,33.375 r180 bottom
C79 "22uF" 0805C 8.71,33.375 r0 bottom
C80 "22uF" 0805C 2.713,36.788 r0 bottom
C81 "100nF" 0402C 9.494,36 r270 bottom
C82 "100nF" 0201C 12.868,44.295 r180 bottom
C83 "100nF" 0201C 12.868,45.045 r180 bottom
C84 "220pF" 0402C 8.946,39.369 r180 top
C85 "220pF" 0402C 9.64,33.34 r270 top
C86 "100nF" 0201C 15.023,45.759 r180 bottom
C87 "100nF" 0201C 15.023,46.509 r180 bottom
C88 "100nF" 0201C 15.023,40.595 r180 bottom
C89 "100nF" 0201C 15.023,39.845 r180 bottom
C90 "1uF" 0402C 7.597,36.317 r0 top
C91 "100nF" 0402C 7.597,37.435 r0 top
C92 "1uF" 0402C 14.149,34.65 r180 top
C93 "100nF" 0402C 14.149,35.65 r180 top
C94 "4.7uF" 0402C 101.641,61.247 r0 bottom
C95 "100nF" 0402C 101.641,62.247 r0 bottom
C96 "4.7uF" 0402C 101.641,66.247 r0 bottom
C97 "100nF" 0402C 101.641,65.252 r0 bottom
C98 "4.7uF" 0402C 97.24,65.574 r180 bottom
C99 "100nF" 0402C 97.24,64.574 r180 bottom
C100 "4.7uF" 0402C 97.24,62.574 r180 bottom
C101 "100nF" 0402C 97.24,63.574 r180 bottom
C102 "30pF" 0402C 94.343,61.299 r0 top
C103 "30pF" 0402C 94.343,62.442 r0 top
C104 "47uF" 0805C 105.71,63.547 r0 top
C105 "1uF" 0402C 100.744,68.993 r270 top
C106 "1uF" 0402C 101.844,68.993 r270 top
C107 "47uF" 0805C 105.71,65.554 r0 top
C108 "1uF" 0402C 97.479,68.993 r270 top
C109 "1uF" 0402C 99.613,68.993 r270 top
C110 "22uF" 0603C 25.166,20.176 r0 top
C111 "47uF" 0805C 105.71,59.534 r0 top
C112 "4.7uF" 0402C 101.641,64.247 r0 bottom
C113 "100nF" 0402C 101.641,63.247 r0 bottom
C114 "4.7uF" 0402C 103.956,68.993 r270 top
C115 "1uF" 0402C 101.228,52.232 r180 top
C116 "1uF" 0402C 101.328,56.982 r180 top
C117 "1uF" 0402C 104.928,52.282 r180 top
C118 "220nF" 0402C 104.528,56.982 r180 top
C119 "100nF" 0402C 108.653,58.46 r0 bottom
C120 "100nF" 0402C 108.94,65.23 r0 bottom
C121 "100nF" 0402C 92.815,26.569 r90 top
C122 "47uF" 0805C 105.71,61.54 r0 top
C123 "22uF" 0603C 94.034,26.544 r90 top
C124 "22uF" 0603C 95.405,26.544 r90 top
C125 "10uF" 0603C 102.23,21.319 r180 bottom
C126 "10nF" 0402C 96.763,30.594 r270 bottom
C127 "10uF" 0603C 102.23,21.319 r180 top
C128 "100nF_DNP" 0402C 92.356,31.476 r180 bottom
C129 "10uF" 0603C 102.204,40.217 r180 top
C130 "100nF" 0402C 87.592,59.28 r0 bottom
C131 "100nF" 0402C 87.592,58.08 r0 bottom
C132 "100nF" 0402C 102.66,47.665 r0 top
C133 "100nF" 0402C 102.66,46.665 r0 top
C134 "100nF" 0402C 44.196,32.855 r0 bottom
C135 "100nF" 0402C 87.592,52.58 r0 bottom
C136 "100nF" 0402C 87.592,45.443 r0 bottom
C137 "100nF" 0402C 87.592,43.043 r0 bottom
C138 "100nF" 0402C 87.592,44.243 r0 bottom
C139 "100nF" 0402C 87.592,41.843 r0 bottom
C140 "100nF" 0402C 44.196,33.845 r0 bottom
C141 "220μF/16V_DNP" "CAP SMT_6.3x7.7" 37.211,9.846 r90 bottom
C142 "1uF_DNP" 0402C 87.833,53.873 r90 top
C143 "100nF_DNP" 0402C 88.976,53.873 r90 top
C150 "100nF" 0402C 33.579,58.788 r180 bottom
C151 "100nF" 0402C 33.579,59.956 r180 bottom
C152 "100nF" 0402C 78.791,66.624 r180 bottom
C153 "100nF" 0402C 76.86,66.624 r0 bottom
D2 "LED_G" 0603LED_G 28.671,9.762 r270 top
D3 "BAT54C" SOT_233_N 27.229,63.652 r0 bottom
D4 "BAT54HT1G" SOD_323 86.66,10.042 r90 bottom
D5 "LMBR140ET1G" SOD_323 15.601,66.626 r0 top
D7 "MBR0540" SOD_123 3.826,62.726 r90 bottom
D8 "BAT54HT1G" SOD_323 13.05,39.252 r0 top
DT1 "PSD15C" SOD_323_D 2.667,12.319 r270 bottom
DT2 "RClamp0502B" SOT_523 6.053,12.387 r180 bottom
DT3 "ESD5341N" 0402TVS-ESD5341N 6.573,13.826 r180 bottom value=ESD5341N-2/TR
DT4 "ESD5451N-2/TR" 0402TVS 21.583,1.49 r270 top
DT5 "ESD5451N-2/TR" 0402TVS 13.533,1.49 r270 top
DT6 "ESD5451N-2/TR" 0402TVS 29.633,1.49 r270 top
DT7 "ESD5451N-2/TR" 0402TVS 70.441,16.9 r270 bottom
DT8 "RClamp0502B" SOT_523 5.5,29.824 r180 bottom
DT9 "PUSB3AB6Z" DFN2111-7 68.641,16.8 r270 bottom
DT10 "PUSB3AB6Z" DFN2111-7 74.241,16.8 r270 bottom
DT11 "ESD5341N" 0402TVS-ESD5341N 13.701,62.126 r0 bottom value=ESD5341N-2/TR
DT12 "ESD5341N" 0402TVS-ESD5341N 13.701,64.926 r0 bottom value=ESD5341N-2/TR
DT13 "ESD5341N" 0402TVS-ESD5341N 13.701,63.526 r0 top value=ESD5341N-2/TR
DT14 "ESD5451N-2/TR" 0402TVS 6.976,64.484 r90 bottom
DT15 "ESD5341N" 0402TVS-ESD5341N 13.701,64.926 r0 top value=ESD5341N-2/TR
DT16 "ESD5341N" 0402TVS-ESD5341N 13.701,62.126 r0 top value=ESD5341N-2/TR
DT17 "ESD5451N-2/TR" 0402TVS 1.427,40.741 r90 bottom
DT18 "TPD4E05U06DQAR" USON-10 10.418,46.875 r90 bottom
DT19 "RClamp0502B" SOT_523 4.666,42.968 r180 bottom
DT20 "TPD4E05U06DQAR" USON-10 10.433,40.975 r90 bottom
DT21 "TPD4E05U06DQAR" USON-10 10.418,43.925 r90 bottom
DT22 "ESD5451N-2/TR" 0402TVS 112.232,59.004 r90 bottom
DT23 "ESD5451N-2/TR" 0402TVS 112.496,65.75 r90 bottom
DT24 "ESD5451N-2/TR" 0402TVS 117.288,58.954 r270 bottom
DT25 "ESD5451N-2/TR" 0402TVS 118.35,65.725 r90 bottom
DT26 "ESD5451N-2/TR" 0402TVS 103.563,26.412 r0 bottom
DT27 "ESD5451N-2/TR" 0402TVS 105.329,23.301 r90 top
DT28 "RClamp0502B" SOT_523 103.982,33.537 r0 top
DT29 "RClamp0502B" SOT_523 104.008,36.153 r0 top
DT30 "RClamp0524P" DFN_10L 105.784,48.224 r90 top
DT31 "ESD5451N-2/TR" 0402TVS 105.354,42.859 r270 top
DT33 "RClamp0502B" SOT_523 116.52,49.741 r0 bottom
DT35 "ESD5341N" 0402TVS-ESD5341N 6.573,10.929 r180 bottom value=ESD5341N-2/TR
F2 "0.5A" 1210F 2.227,31.05 r270 bottom
F3 "0.5A" 1210F 102.23,23.961 r180 bottom
F4 "0.5A" 1210F 102.23,23.961 r180 top
F5 "1A" 1210F 102.23,42.96 r180 top
FB1 "120ohm" 0603L 90.266,6.74 r0 bottom
FB2 "120ohm" 0603L 90.266,8.238 r0 bottom
FB3 "120ohm 100MHz" 0603L 54.309,14.413 r180 bottom
FB4 "120ohm 100MHz" 0603L 57.509,14.413 r0 bottom
FB5 "120ohm 100MHz" 0603L 87.193,4.073 r0 bottom
FB6 "120ohm" 0603L 96.929,26.544 r90 top
K1 "TS3425BA" KEY4-4_6-3_2-H2_5 18.283,1.99 r0 top locked
K2 "TS3425BA" KEY4-4_6-3_2-H2_5 10.233,1.99 r0 top locked
K3 "TS3425BA" KEY4-4_6-3_2-H2_5 26.333,1.99 r0 top locked
L1 "2.2uH" L_4*4*2 15.81,15.15 r0 top
L2 "0.68uH" L_4*4*2 25.435,10.6 r90 top
L3 "2.2uH" L_2.1*1.6 90.368,10.245 r180 bottom
M1 "HOLE_3.2MM_DNP" HOLE_3.2MM#1 93.5,-11.5 r0 top locked
M2 "HOLE_3.2MM_DNP" HOLE_3.2MM#2 3.5,71.5 r0 top locked
M3 "HOLE_3.2MM_DNP" HOLE_3.2MM#3 3.5,-1.5 r0 top locked
M4 "HOLE_3.2MM_DNP" HOLE_3.2MM#4 94.1,79.974 r0 top locked
M5 "N-HOLE_2.0MM_DNP" N-HOLE_2.0MM -2.54,50 r90 top
M6 "N-HOLE_2.0MM_DNP" N-HOLE_2.0MM -2.54,20 r90 top
M7 "N-HOLE_2.0MM_DNP" N-HOLE_2.0MM 122.5,57 r90 top
M8 "N-HOLE_2.0MM_DNP" N-HOLE_2.0MM 122.5,20.5 r90 top
M9 "MARK_DNP" "Mark Point_circle" 99.314,72.771 r270 bottom
M10 "MARK_DNP" "Mark Point_circle" 117.348,9.271 r270 bottom
M11 "MARK_DNP" "Mark Point_circle" 99.314,72.771 r90 top
M12 "MARK_DNP" "Mark Point_circle" 14.097,21.336 r90 top
M13 "MARK_DNP" "Mark Point_circle" 20.574,49.53 r90 top
M14 "MARK_DNP" "Mark Point_circle" 9.779,20.32 r270 bottom
M15 "QR Code_DNP" "QR Code" 84.78,17.865 r180 bottom
M16 "HOLE_3.2MM_DNP" HOLE_3.2MM#2 61.5,71.5 r0 top locked
M17 "HOLE_3.2MM_DNP" HOLE_3.2MM#2 3.5,22.5 r0 top locked
M18 "QR Code_DNP" "QR Code" 26.889,26.926 r0 top (schematic designator M15)
P1 "3588_RIGHT_DOWN" SOCKET_100PIN_0.4MM_F 36.5,51 r270 top locked
P2 "3588_LEFT_DOWN" SOCKET_100PIN_0.4MM_F 79.5,51 r270 top locked
P3 "3588_RIGHT_UP" SOCKET_100PIN_0.4MM_F 36,17 r270 top locked
P4 "3588_LEFT_UP" SOCKET_100PIN_0.4MM_F 80,17 r270 top locked
P5 "USB_TYPEC_2.0" USB_TYPE-C_S 4.11,12.575 r270 top
P7 "Wafer1.0mm XP SMT" CON2-1-4X3_1-H4_3 29.718,48.006 r270 top
P8 "USB 3.0" USB3.0_A-11.78 110.61,48.21 r270 top locked
P9 "M.2_E-Key" M.2_E-Key 24.404,27.161 r270 bottom locked
P10 "USB_TYPEC_2.0" USB_TYPE-C_S 4.133,30.27 r270 top locked
P11 "TFCARD" TF_CARD_SELF 69.291,9.313 r180 bottom locked
P12 "M2" HOLE3.6-5.6 54.154,27.161 r0 bottom
P13 "FC-H021LNL" RJ45_Gigabit 110.79,9.54 r270 top locked
P14 "FPC26_OV13850" FPC26-a 48.741,4.205 r180 bottom locked
P15 "FPC30_MIPI_DSI" FPC30 25.35,4.125 r0 bottom locked
P16 "FPC15" FPC15-1-22_1X4_5-H5_4 86.147,12.189 r270 top locked
P17 "HDMI" HDMI 6.609,59.975 r90 top locked
P18 "USB_TYPEC" USB_TYPEC_SMT 4.258,43.175 r270 top locked value=TYPEC-507DSW-ACP24F
P19 "PH2.0-2PS" PH2.0_2P_V 115.043,71.793 r0 top
P20 "6050-P 52DB" "MIC 2*5" 107.826,71.074 r0 top
P21 "PJ-3536X" PJ3930-8P 114.702,62.381 r180 top
P22 "USB_A_H_Double" USB_A_F_W_2 110.93,29.388 r90 top locked
P24 "M.2_M-Key" M.2_M-Key 94.075,50.58 r90 bottom locked
P25 "M2" HOLE3.6-5.6 14.325,50.58 r180 bottom locked
P26 "Header 20X2_2.54SPZ" HEADER2*20_2.54_SPZ 32.5,71.513 r0 top locked
P28 "Header 10X2_2.54SPZ" HEADER2*10_2.54_SPZ 77.8,71.487 r0 top locked
Q1 "S8550" SOT_233_N 10.3,15.9 r0 top
Q2 "S8050" SOT_233_N 10.3,15.9 r180 bottom
Q3 "AO 3401" SOT_233_W 64.841,16.6 r0 bottom
Q4 "CQA34N00" SOT_233_W 64.841,20.634 r0 bottom
Q5 "CQA34N00" SOT_233_W 17.406,30.253 r180 top
Q6 "CQA34N00" SOT_233_W 17.415,26.708 r180 top
Q7 "CQA34N00" SOT_233_W 100.256,17.388 r270 bottom
Q8 "L2SK3018WT1G" SOT323 19.301,65.026 r270 top
Q9 "L2SK3018WT1G" SOT323 19.301,67.426 r270 top
Q10 "WNM6002" SOT_323 18.951,60.476 r90 bottom
Q11 "WNM6002" SOT_323 22.001,55.976 r90 bottom
Q12 "WNM6002" SOT_323 18.951,57.451 r90 bottom
Q13 "WNM6002" SOT_323 22.001,58.976 r90 bottom
Q14 "L2SK3018WT1G" SOT323 19.301,62.626 r270 top
Q15 "L2SK3018WT1G" SOT323 19.301,66.226 r270 bottom
Q16 "L2SK3018WT1G" SOT323 19.301,63.826 r270 bottom
R1 "2.2K_1%" 0402R 75.595,58.8 r0 bottom
R2 "2.2K_1%" 0402R 75.595,60.8 r0 bottom
R3 "2.2K_1%" 0402R 74.681,53.187 r0 bottom
R4 "2.2K_1%" 0402R 74.681,52.171 r0 bottom
R5 "2.2K_1%" 0402R 40.183,47.879 r180 bottom
R6 "2.2K_1%" 0402R 40.183,46.863 r180 bottom
R7 "4.7K" 0402R 20.645,21.711 r0 top
R8 "4.7K" 0402R 20.645,20.72 r0 top
R9 "2.2K_1%" 0402R 76.276,19.787 r90 bottom
R10 "2.2K_1%" 0402R 76.276,17.45 r90 bottom
R11 "2.2K_1%" 0402R 74.681,55.22 r0 bottom
R12 "2.2K_1%" 0402R 74.681,54.204 r0 bottom
R13 "2.2K_1%" 0402R 32.727,62.154 r90 bottom
R14 "2.2K_1%" 0402R 31.711,62.154 r90 bottom
R15 "10K" 0402R 24.642,14.588 r90 bottom
R16 "0R_1%" 0402R 8.598,7.293 r90 bottom
R17 "2K_1%" 0402R 9.799,12.506 r0 bottom
R18 "22K" 0402R 9.799,11.083 r180 bottom
R19 "0R_1%" 0402R 9.799,13.547 r180 bottom
R20 "4.7K" 0402R 20.645,19.73 r0 top
R21 "3.65M_1%" 0603R 15.565,13.953 r0 bottom
R22 "150K_1%" 0402R 16.632,11.464 r0 bottom
R23 "100K" 0402R 12.593,15.858 r270 top
R24 "20K_1%" 0402R 15.057,10.956 r270 bottom
R25 "20K_1%" 0402R 8,16.4 r90 bottom
R26 "100K" 0402R 16.632,10.448 r180 bottom
R27 "20K_1%" 0402R 12.593,15.858 r90 bottom
R28 "10K" 0402R 28.925,11.998 r0 top
R29 "200K_1%" 0402R 22.212,10.055 r90 bottom
R30 "10K" 0402R 20.212,10.055 r90 bottom
R31 "10K" 0402R 19.212,10.055 r90 bottom
R32 "44.2K_1%" 0402R 21.212,10.055 r270 bottom
R33 "10K" 0402R 61.441,16.9 r270 bottom
R34 "5.1K_1%" 0402R 6.596,31.787 r0 bottom
R35 "5.1K_1%" 0402R 7.8,29.32 r270 bottom
R36 "20K_1%" 0402R 61.441,20.2 r270 bottom
R37 "1K_1%" 0402R 62.441,20.2 r270 bottom
R38 "10K" 0402R 10.72,23.692 r90 top
R39 "22R" 0402R 67.081,19.787 r270 bottom
R40 "22R" 0402R 67.97,19.787 r270 bottom
R41 "22R" 0402R 68.885,19.787 r270 bottom
R42 "22R" 0402R 71.755,19.787 r270 bottom
R43 "22R" 0402R 72.669,19.787 r270 bottom
R44 "22R" 0402R 73.584,19.787 r270 bottom
R45 "10K" 0402R 75.413,19.787 r90 bottom
R46 "22R" 0402R 74.498,19.787 r270 bottom
R47 "10K" 0402R 19.743,30.222 r90 top
R48 "10K" 0402R 19.743,26.704 r90 top
R49 "22R" 0402R 97.963,17.509 r270 top
R50 "22R" 0402R 97.455,19.643 r270 top
R51 "22R" 0402R 96.896,17.509 r270 top
R52 "4.7K" 0402R 89.962,9.915 r180 top
R53 "22R" 0402R 96.362,19.643 r270 top
R54 "4.7K" 0402R 89.149,19.643 r90 top
R55 "22R" 0402R 95.821,17.509 r270 top
R56 "4.7K" 0402R 90.165,19.643 r90 top
R57 "22R" 0402R 95.27,19.643 r270 top
R58 "22R" 0402R 94.229,17.509 r270 top
R59 "22R" 0402R 93.213,17.509 r270 top
R60 "22R" 0402R 92.197,17.509 r270 top
R61 "22R" 0402R 91.181,17.509 r270 top
R62 "4.7K" 0402R 91.181,19.643 r90 top
R63 "22R" 0402R 90.165,17.509 r270 top
R64 "22R" 0402R 89.149,17.509 r270 top
R65 "4.7K" 0402R 92.197,19.643 r90 top
R66 "4.7K" 0402R 93.213,19.643 r90 top
R67 "4.7K" 0402R 94.229,19.643 r90 top
R68 "4.7K" 0402R 101.49,17.544 r270 top
R69 "4.7K" 0402R 89.962,10.931 r0 top
R70 "4.7K" 0402R 99.306,17.544 r270 top
R71 "4.7K" 0402R 113.284,8.255 r0 bottom
R72 "4.7K" 0402R 113.283,11.298 r0 bottom
R73 "2.49K_1%" 0402R 101.747,5.267 r90 top
R74 "4.7K" 0402R 89.962,8.899 r180 top
R75 "10K" 0402R 100.656,19.688 r0 bottom
R76 "330R" 0402R 113.284,9.271 r0 bottom
R77 "330R" 0402R 113.284,10.287 r0 bottom
R78 "10K" 0402R 57.209,21.613 r0 bottom
R79 "10K" 0402R 53.909,21.613 r0 bottom
R80 "10K" 0402R 50.609,21.613 r0 bottom
R81 "10K" 0402R 21.501,65.026 r90 top
R82 "1.8K" 0402R 16.301,63.526 r180 top
R83 "10K" 0402R 23.173,67.857 r180 top
R84 "1K_1%" 0402R 23.172,66.839 r180 top
R85 "1.8K" 0402R 16.301,64.926 r180 top
R86 "470R_1%" 0201R 15.631,60.846 r0 bottom
R87 "470R_1%" 0201R 15.631,60.096 r0 bottom
R88 "470R_1%" 0201R 17.126,56.333 r0 bottom
R89 "470R_1%" 0201R 17.126,55.583 r0 bottom
R90 "470R_1%" 0201R 15.656,57.833 r0 bottom
R91 "470R_1%" 0201R 15.656,57.083 r0 bottom
R92 "470R_1%" 0201R 17.126,59.346 r0 bottom
R93 "470R_1%" 0201R 17.126,58.596 r0 bottom
R94 "27K" 0402R 21.501,62.626 r90 top
R95 "4.7K" 0402R 20.645,22.701 r0 top
R96 "47K" 0402R 21.501,66.226 r90 bottom
R97 "47K" 0402R 21.501,63.826 r270 bottom
R98 "1.2K_1%" 0402R 16.301,65.226 r180 bottom
R99 "47K" 0402R 16.301,66.326 r180 bottom
R100 "100K" 0402R 13.571,40.835 r180 top
R101 "100K" 0402R 11.181,38.963 r0 bottom
R102 "4.7K" 0402R 9.494,38.025 r90 bottom
R103 "1K_1%" 0402R 13.365,38.963 r180 bottom
R104 "2.2M_1%" 0201R 10.435,44.298 r180 top
R105 "2.2M_1%" 0201R 10.435,45.048 r180 top
R106 "100K" 0402R 13.571,41.71 r180 top
R107 "2.2Ω_1%" 0402R 14.664,42.751 r180 bottom
R108 "2.2Ω_1%" 0402R 14.664,43.601 r180 bottom
R109 "0R" 0201R 13.869,46.008 r180 top
R110 "0R" 0201R 13.869,46.733 r180 top
R111 "0R" 0201R 12.868,42.094 r180 bottom
R112 "0R" 0201R 12.868,41.344 r180 bottom
R113 "4.7K" 0402R 14.149,37.55 r0 top
R114 "4.7K" 0402R 14.149,36.65 r180 top
R115 "4.7K" 0402R 20.645,24.685 r180 top
R116 "33R" 0402R 94.33,64.169 r0 top
R117 "33R" 0402R 94.33,66.76 r0 top
R118 "33R" 0402R 94.33,67.624 r0 top
R119 "33R" 0402R 94.33,65.033 r0 top
R120 "33R" 0402R 94.33,65.896 r0 top
R121 "10K" 0402R 101.341,59.013 r180 top
R122 "2.2K_1%" 0402R 98.546,68.993 r270 top
R123 "2.2K_1%" 0402R 102.889,68.993 r270 top
R124 "100K" 0402R 117.22,65.725 r90 bottom
R125 "10K" 0402R 101.892,52.609 r0 bottom
R126 "100K" 0402R 116.102,65.725 r270 bottom
R127 "100K" 0402R 115.288,58.929 r270 bottom
R128 "22R" 0402R 108.648,59.488 r0 bottom
R129 "22R" 0402R 108.94,66.258 r0 bottom
R130 "1K_1%" 0402R 116.288,58.929 r270 bottom
R131 "22R" 0402R 110.232,58.979 r90 bottom
R132 "10K" 0402R 111.232,58.979 r270 bottom
R133 "22R" 0402R 110.54,65.75 r90 bottom
R134 "10K" 0402R 111.53,65.75 r270 bottom
R135 "20K_1%" 0402R 40.33,41.208 r0 bottom
R136 "10K_1%" 0402R 40.33,42.224 r180 bottom
R137 "10K" 0402R 96.288,28.844 r0 bottom
R138 "2.2Ω_1%" 0402R 100.934,35.71 r0 top
R139 "2.2Ω_1%" 0402R 100.934,36.61 r0 top
R140 "100K" 0402R 92.376,28.544 r180 bottom
R141 "100K" 0402R 92.356,30.476 r180 bottom
R142 "100K" 0402R 92.376,29.544 r180 bottom
R143 "2.2Ω_1%" 0402R 100.934,33.094 r0 top
R144 "2.2Ω_1%" 0402R 100.934,33.994 r0 top
R145 "2.7K_1%" 0402R 92.356,32.476 r0 bottom
R146 "2.2Ω_1%" 0402R 116.088,47.353 r90 bottom
R147 "2.2Ω_1%" 0402R 116.951,47.353 r90 bottom
R148 "2.2Ω_1%" 0402R 102.655,49.792 r0 top
R149 "10K" 0402R 87.592,53.58 r0 bottom
R150 "10K" 0402R 87.592,54.58 r0 bottom
R151 "10K" 0402R 87.592,55.58 r0 bottom
R152 "2.2Ω_1%" 0402R 102.655,48.892 r0 top
R153 "0R" 0402R 85.186,49.793 r180 top
R154 "0R" 0402R 85.186,50.656 r180 top
R155 "4.7K" 0402R 20.645,23.692 r0 top
R156 "0R" 0402R 85.161,45.653 r180 top
R157 "0R_DNP" 0402R 88.189,30.785 r180 bottom
R158 "0R" 0402R 85.161,46.516 r180 top
R159 "0R" 0402R 85.161,47.735 r180 top
R160 "0R" 0402R 85.161,48.599 r180 top
R161 "0R" 0402R 44.196,28.473 r0 bottom
R162 "0R" 0402R 44.196,29.337 r0 bottom
R163 "0R" 0402R 44.196,30.632 r0 bottom
R164 "0R" 0402R 44.196,31.496 r0 bottom
R165 "49.9R_1%_DNP" 0201R 84.591,55.211 r180 top
R166 "49.9R_1%_DNP" 0201R 84.591,56.405 r180 top
R167 "4.7K_DNP" 0402R 92.837,56.693 r180 top
R168 "33Ω_DNP" 0201R 86.242,55.364 r180 top
R169 "33Ω_DNP" 0201R 86.242,56.253 r180 top
R170 "33Ω_DNP" 0201R 86.242,57.698 r180 top
R171 "33Ω_DNP" 0201R 86.242,58.587 r180 top
R172 "49.9R_1%_DNP" 0201R 84.591,58.739 r180 top
R173 "49.9R_1%_DNP" 0201R 84.591,57.545 r180 top
R180 "2.2K_1%" 0402R 30.695,62.154 r90 bottom
R181 "2.2K_1%" 0402R 29.679,62.154 r90 bottom
R182 "2.2K_1%" 0402R 81.001,66.827 r180 bottom
R183 "2.2K_1%" 0402R 75.047,65.78 r180 bottom
R184 "2.2K_1%" 0402R 81.001,65.811 r180 bottom
R185 "2.2K_1%" 0402R 75.047,64.917 r180 bottom
R186 "2.2K_1%" 0402R 81.001,64.795 r180 bottom
R187 "2.2K_1%" 0402R 75.047,64.053 r180 bottom
R188 "2.2K_1%" 0402R 81.001,63.779 r180 bottom
R189 "2.2K_1%" 0402R 75.047,63.19 r180 bottom
U1 "RT9013-18GB" SOT_235 26.891,14.162 r0 bottom
U2 "CH224A" ESSOP11-1-6X5-H1_8 10.4,10 r90 top
U3 "MP8765GQ" QFN16P_MP8765 15.675,10.85 r90 top
U4 "MP2147GD" QFN_2*3 21.185,9.8 r180 top
U5 "CP2102N-A02-G" QFN28P_0.5BSC_5*5_H 11.723,28.583 r0 top
U6 "RX8010SJ" SOP8_1.27-7.2x4-h2.65 27,62.484 r0 top locked
U7 "RTL8211FSI-CG" QFN48-0_4-6X6-PH1_0 95.7,11.8 r180 top locked
U8 "TPD4E05U06DQAR" USON-10 102.281,8.543 r90 bottom
U9 "TPD4E05U06DQAR" USON-10 102.281,13.953 r90 bottom
U10 "XC6227C121MR-G" SOT_235 57.609,18.213 r270 bottom
U11 "RT9013-28GB" SOT_235 54.309,18.213 r270 bottom
U12 "RT9013-18GB" SOT_235 51.009,18.213 r270 bottom
U13 "TPD4E05U06DQAR" USON-10 13.201,59.726 r90 top
U14 "TPD4E05U06DQAR" USON-10 13.201,56.726 r90 top
U15 "SGM2588CYN5G/TR" SOT_235 11.994,36.45 r0 bottom
U16 "FUSB302BMPX" WQFN14_0.5_2.5x2.5 10.744,36.45 r90 top
U17 "NAU88C22YG" QFN32P_0.5BSC_5*5_H_3..65*3.65 99.497,63.782 r270 top locked
U18 "RT9013-18GB" SOT_235 101.728,54.632 r90 top
U19 "SGM2034-3.3YN3G/TR" SOT_233_N 104.956,54.677 r270 top
U20 "FE1.1s-BQFN24BT" QFN24_0.5BSC_4.15*4.15 94.788,30.844 r180 top
U21 "DSC557-0344FI1_DNP" QFN14_2.5*3.2 89.281,56.972 r180 top
U23 "LSF0204RUTR" UQFN 31.203,59.36 r90 bottom
U24 "LSF0204RUTR" UQFN 78.111,64.586 r180 bottom
X1 "25MHZ" Crystals_3225 99.131,3.387 r90 top
X2 "24MHZ" Crystals_3225 50.907,11.038 r270 bottom
X3 "12MHZ" Crystals_3225 100.023,29.262 r90 top

## Footprints (in the part's own frame and the unit in brackets; to place one, negate y for a bottom-side part, rotate by r counter-clockwise, add the part's x,y. Pads: shape width x height; smd on the part's side, far side on the other; paste and mask are expansions set on the pad)
0201C [mil] "CC0201"
  rect 18.5x15 smd mask+1.97: 1(-13.5,0) 2(13.5,0)
  silkscreen extent -20,-14 20,15, body extent -12,-6 12,6, height 12
0201R [mil] "CC0201"
  rect 18.5x15 smd mask+1.97: 1(-13.5,0) 2(13.5,0)
  silkscreen extent -30,-14 30,14, body extent -12,-6 12,6, height 12
0402C [mil]
  rect 24x21 smd mask+1.97: 1(-20,0) 2(20,0)
  silkscreen extent -25,-19 25,19, body extent -20,-10 20,10, height 14
0402R [mm]
  rect 0.61x0.533 smd mask+0.05: 1(-0.508,0) 2(0.508,0)
  silkscreen extent -0.99,-0.43 0.99,0.43, body extent -0.5,-0.25 0.5,0.25, height 0.35
0402TVS [mm]
  rect 0.6x0.55 smd mask+0.05: 1(-0.508,0) 2(0.508,0)
  silkscreen extent -0.94,-0.41 0.94,0.41, body extent -0.57,-0.27 0.58,0.28, height 0.41
0402TVS-ESD5341N [mm]
  rect 0.6x0.55 smd mask+0.05: 1(-0.508,0) 2(0.508,0)
  silkscreen extent -1.16,-0.41 0.94,0.41, body extent -0.57,-0.27 0.58,0.28, height 0.41
0603C [mm]
  rect 0.8x0.9 smd mask+0.05: 1(-0.787,0) 2(0.787,0)
  silkscreen extent -0.76,-0.64 0.74,0.64, body extent -0.8,-0.4 0.8,0.4, height 0.6
0603L [mm]
  rect 0.8x0.9 smd mask+0.05: 1(-0.787,0) 2(0.787,0)
  silkscreen extent -1.4,-0.75 1.4,0.75, body extent -0.85,-0.4 0.85,0.4, height 0.56
0603LED_G [mm]
  rect 0.8x1 smd mask+0.05: 1(-0.8,0) 2(0.8,0)
  silkscreen extent -1.42,-0.71 1.93,0.71, body extent -0.85,-0.51 0.85,0.51, height 0.6
0603R [mm]
  rect 0.8x0.9 smd mask+0.05: 1(-0.787,0) 2(0.787,0)
  silkscreen extent -1.4,-0.75 1.4,0.75, body extent -0.85,-0.4 0.85,0.4, height 0.56
0805C [mm]
  rect 1.15x1.45 smd mask+0.05: 1(-1.016,0) 2(1.016,0)
  silkscreen extent -1,-1 1,1, body extent -1,-0.63 1,0.63, height 0.6
1206C [mm]
  rect 1.4x1.8 smd mask+0.05: 1(-1.55,0) 2(1.55,0)
  silkscreen extent -1.5,-1.17 1.5,1.17, body extent -1.6,-0.8 1.6,0.8, height 0.6
1210F [mm]
  rect 1.3x2.7 smd mask+0.05: 1(-1.5,0) 2(1.5,0)
  silkscreen extent -2.34,-1.6 2.34,1.6, body extent -1.61,-1.29 1.61,1.29, height 0.67
"CAP SMT_6.3x7.7" [mm]
  rect 3x1 smd mask+0.05: 1(-2.6,0) 2(2.6,0)
  silkscreen extent -3.3,-3.3 3.3,3.3
CON2-1-4X3_1-H4_3 [mm]
  rect 1.2x1.8 smd paste+0 mask+0.05: 0(-1.8,-0.65) 0(1.8,-0.65)
  rect 0.6x1.55 smd paste+0 mask+0.05: 1(-0.5,1.875) 2(0.5,1.875)
  silkscreen extent -2,0.52 2,1.45
Crystals_3225 [mm]
  oct 1.45x1.35 smd mask+0.05: 1(-1.325,-1)
  rect 1.45x1.35 smd mask+0.05: 2(1.325,-1) 3(1.325,1) 4(-1.325,1)
  silkscreen extent -2.66,-1.75 2.04,1.73, body extent -1.6,-1.25 1.6,1.25, height 0.61
DFN2111-7 [mm] "SON, 10-Leads, Body 2.00x2.00mm, Pitch 0.40mm, IPC Medium Density"
  rect 0.5x0.25 smd mask+0.05: 1(-0.35,0.75) 2(-0.35,0.25) 3(-0.35,-0.25) 4(-0.35,-0.75) 5(0.35,-0.5) 6(0.35,0) 7(0.35,0.5)
  01 TOP region: -0.6,0.625 -0.6,0.875 -0.2,0.875 -0.2,0.975 -0.1,0.975 -0.1,0.625
  silkscreen extent -0.95,-1.1 0.6,1.1
DFN_10L [mm]
  rect 0.2x0.675 smd mask+0.05: 1(-1,-0.441) 2(-0.5,-0.44) 4(0.5,-0.44) 5(1,-0.44) 6(1,0.441) 7(0.5,0.441) 9(-0.5,0.441) 10(-1,0.44)
  rect 0.4x0.755 smd mask+0.05: 3(0,-0.4) 8(0,0.4)
  01 TOP region: -0.177,-0.298 0.179,-0.298 0.179,0.356 -0.177,0.356
  silkscreen extent -1.47,-1.09 1.26,0.5, body extent -1.25,-0.5 1.25,0.51, height 0.56
ESSOP11-1-6X5-H1_8 [mm]
  rect 1.5x0.43 smd paste+0 mask+0.05: 1(-3,2) 2(-3,1) 3(-3,0) 4(-3,-1) 5(-3,-2) 6(3,-2) 7(3,-1) 8(3,0) 9(3,1) 10(3,2)
  rect 2.3x3.2 smd paste+0 mask+0.05: 11(0,0)
  silkscreen extent -4.07,-2.5 1.95,2.5
FPC15-1-22_1X4_5-H5_4 [mm]
  rect 0.5x1.5 smd paste+0 mask+0.05: 1(7,1.65) 2(6,-1.65) 3(5,1.65) 4(4,-1.65) 5(3,1.65) 6(2,-1.65) 7(1,1.65) 8(0,-1.65) 9(-1,1.65) 10(-2,-1.65) 11(-3,1.65) 12(-4,-1.65) 13(-5,1.65) 14(-6,-1.65) 15(-7,1.65)
  rect 2x1.6 smd paste+0 mask+0.05: 16(-9.4,0) 17(9.4,0)
  silkscreen extent -11.05,-1.25 11.05,1.91
FPC26-a [mm]
  rect 2.4x1.7 smd mask+0.05: 0(-7.95,-1.262) 0(7.95,-1.025)
  oval 0.23x1.7 smd mask+0.05: 1(6.25,1.575) 2(5.75,1.575) 3(5.25,1.575) 4(4.75,1.575) 5(4.25,1.575) 6(3.75,1.575) 7(3.25,1.575) 8(2.75,1.575) 9(2.25,1.575) 10(1.75,1.575) 11(1.25,1.575) 12(0.75,1.575) 13(0.25,1.575) 14(-0.25,1.575) 15(-0.75,1.575) 16(-1.25,1.575) 17(-1.75,1.575) 18(-2.25,1.575) 19(-2.75,1.575) 20(-3.25,1.575) 21(-3.75,1.575) 22(-4.25,1.575) 23(-4.75,1.575) 24(-5.25,1.575) 25(-5.75,1.575) 26(-6.25,1.575)
  silkscreen extent -8.8,-4.12 8.8,3.95, body extent -8.7,-4.13 8.7,1.92, height 2.05
FPC30 [mm]
  rect 2.4x1.7 smd mask+0.05: 0(-8.95,1.262) 0(8.95,1.025)
  rect 0.25x1.7 smd mask+0.05: 1(7.25,-1.575) 2(6.75,-1.575) 3(6.25,-1.575) 4(5.75,-1.575) 5(5.25,-1.575) 6(4.75,-1.575) 7(4.25,-1.575) 8(3.75,-1.575) 9(3.25,-1.575) 10(2.75,-1.575) 11(2.25,-1.575) 12(1.75,-1.575) 13(1.25,-1.575) 14(0.75,-1.575) 15(0.25,-1.575) 16(-0.25,-1.575) 17(-0.75,-1.575) 18(-1.25,-1.575) 19(-1.75,-1.575) 20(-2.25,-1.575) 21(-2.75,-1.575) 22(-3.25,-1.575) 23(-3.75,-1.575) 24(-4.25,-1.575) 25(-4.75,-1.575) 26(-5.25,-1.575) 27(-5.75,-1.575) 28(-6.25,-1.575) 29(-6.75,-1.575) 30(-7.25,-1.575)
  silkscreen extent -9.8,-3.95 9.8,4.02, body extent -9.7,-1.92 9.7,4.13, height 2
HDMI [mm]
  rect 0.3x2.6 smd mask+0.05: 1(-4.5,-3.428) 2(-4,-3.428) 3(-3.5,-3.43) 4(-3,-3.428) 5(-2.5,-3.428) 6(-2,-3.428) 7(-1.5,-3.428) 8(-1,-3.428) 9(-0.5,-3.428) 10(0,-3.428) 11(0.5,-3.428) 12(1,-3.43) 13(1.5,-3.428) 14(2,-3.428) 15(2.5,-3.428) 16(3,-3.428) 17(3.5,-3.428) 18(4,-3.428) 19(4.5,-3.428)
  oval 2x3.5 hole 0.8 slot 2.5 at 90 deg mask+0.05: 20(-7.239,-2.539) 20(-7.239,3.43) 20(7.239,-2.539) 20(7.239,3.43)
  silkscreen extent -7.39,-5.46 7.47,7.65
HEADER2*10_2.54_SPZ [mm]
  rect 1.5x1.5 hole 1 mask+0.05: 1(-11.43,-1.27)
  round 1.5 hole 1 mask+0.05: 2(-11.43,1.27) 3(-8.89,-1.27) 4(-8.89,1.27) 5(-6.35,-1.27) 6(-6.35,1.27) 7(-3.81,-1.27) 8(-3.81,1.27) 9(-1.27,-1.27) 10(-1.27,1.27) 11(1.27,-1.27) 12(1.27,1.27) 13(3.81,-1.27) 14(3.81,1.27) 15(6.35,-1.27) 16(6.35,1.27) 17(8.89,-1.27) 18(8.89,1.27) 19(11.43,-1.27) 20(11.43,1.27)
  silkscreen extent -12.7,-2.5 12.7,2.5, body extent -12.7,-2.5 12.7,2.5, height 8.59
HEADER2*20_2.54_SPZ [mm]
  rect 1.5x1.5 hole 1 mask+0.05: 1(-24.13,-1.27)
  round 1.5 hole 1 mask+0.05: 2(-24.13,1.27) 3(-21.59,-1.27) 4(-21.59,1.27) 5(-19.05,-1.27) 6(-19.05,1.27) 7(-16.51,-1.27) 8(-16.51,1.27) 9(-13.97,-1.27) 10(-13.97,1.27) 11(-11.43,-1.27) 12(-11.43,1.27) 13(-8.89,-1.27) 14(-8.89,1.27) 15(-6.35,-1.27) 16(-6.35,1.27) 17(-3.81,-1.27) 18(-3.81,1.27) 19(-1.27,-1.27) 20(-1.27,1.27) 21(1.27,-1.27) 22(1.27,1.27) 23(3.81,-1.27) 24(3.81,1.27) 25(6.35,-1.27) 26(6.35,1.27) 27(8.89,-1.27) 28(8.89,1.27) 29(11.43,-1.27) 30(11.43,1.27) 31(13.97,-1.27) 32(13.97,1.27) 33(16.51,-1.27) 34(16.51,1.27) 35(19.05,-1.27) 36(19.05,1.27) 37(21.59,-1.27) 38(21.59,1.27) 39(24.13,-1.27) 40(24.13,1.27)
  silkscreen extent -25.4,-2.54 25.4,2.54, body extent -25.4,-2.5 25.4,2.5, height 8.54
HOLE3.6-5.6 [mm]
  round 5.8 hole 3.6 mask+0.05: 1(0,0)
HOLE_3.2MM#1 [mm]
  round 6 hole 3.2 mask+0.05: 0(0.6,15)
HOLE_3.2MM#2 [mm]
  round 6 hole 3.2 mask+0.05: 0(0,0)
HOLE_3.2MM#3 [mm]
  round 6 hole 3.2 mask+0.05: 0(0,5)
HOLE_3.2MM#4 [mm]
  round 6 hole 3.2 mask+0.05: 0(0,-8.474)
KEY4-4_6-3_2-H2_5 [mm]
  rect 1.05x0.65 smd mask+0.05: 1(-2.075,1.075) 2(2.075,1.075) 3(-2.075,-1.075) 4(2.075,-1.075)
  silkscreen extent -2.1,-1.65 2.1,1.65
L_2.1*1.6 [mm]
  rect 0.7x1.7 smd mask+0.05: 1(-0.7,0) 2(0.7,0)
  silkscreen extent -1.01,-1.09 1,1.09, body extent -1,-0.8 1,0.8, height 1
L_4*4*2 [mm] "Precision Wire Wound Inductor, 2-Leads, Body 4.00x4.00mm, IPC Medium Density"
  rect 1.1x3.7 smd mask+0.05: 1(-1.5,0) 2(1.5,0)
  silkscreen extent -2.01,-2.13 1.99,2.13, body extent -2.1,-2 2.1,2, height 1.9
M.2_E-Key [mm]
  rect 1.3x2.75 smd mask+0.05: 0(-10.35,3) 0(10.35,3)
  round 1.1 hole 1.1 unplated mask+0.05: 0(-10,-1.5)
  round 1.6 hole 1.6 unplated mask+0.05: 0(10,-1.5)
  rect 0.3x1.55 smd mask+0.05: 1(-9.25,3.775) 2(-9,-3.775) 3(-8.75,3.775) 4(-8.5,-3.775) 5(-8.25,3.775) 6(-8,-3.775) 7(-7.75,3.775) 8(-7.5,-3.775) 9(-7.25,3.775) 10(-7,-3.775) 11(-6.75,3.775) 12(-6.5,-3.775) 13(-6.25,3.775) 14(-6,-3.775) 15(-5.75,3.775) 16(-5.5,-3.775) 17(-5.25,3.775) 18(-5,-3.775) 19(-4.75,3.775) 20(-4.5,-3.775) 21(-4.25,3.775) 22(-4,-3.775) 23(-3.75,3.775) 32(-1.5,-3.775) 33(-1.25,3.775) 34(-1,-3.775) 35(-0.75,3.775) 36(-0.5,-3.775) 37(-0.25,3.775) 38(0,-3.775) 39(0.25,3.775) 40(0.5,-3.775) 41(0.75,3.775) 42(1,-3.775) 43(1.25,3.775) 44(1.5,-3.775) 45(1.75,3.775) 46(2,-3.775) 47(2.25,3.775) 48(2.5,-3.775) 49(2.75,3.775) 50(3,-3.775) 51(3.25,3.775) 52(3.5,-3.775) 53(3.75,3.775) 54(4,-3.775) 55(4.25,3.775) 56(4.5,-3.775) 57(4.75,3.775) 58(5,-3.775) 59(5.25,3.775) 60(5.5,-3.775) 61(5.75,3.775) 62(6,-3.775) 63(6.25,3.775) 64(6.5,-3.775) 65(6.75,3.775) 66(7,-3.775) 67(7.25,3.775) 68(7.5,-3.775) 69(7.75,3.775) 70(8,-3.775) 71(8.25,3.775) 72(8.5,-3.775) 73(8.75,3.775) 74(9,-3.775) 75(9.25,3.775)
  silkscreen extent -10.9,-32.75 10.9,5.27, body extent -10.9,-4.1 10.95,4.25, height 3.1
M.2_M-Key [mm]
  round 1.1 hole 1.1 unplated mask+0.05: 0(-10,-1.5)
  round 1.6 hole 1.6 unplated mask+0.05: 0(10,-1.5)
  rect 0.3x1.55 smd mask+0.05: 1(-9.25,3.775) 2(-9,-3.775) 3(-8.75,3.775) 4(-8.5,-3.775) 5(-8.25,3.775) 6(-8,-3.775) 7(-7.75,3.775) 8(-7.5,-3.775) 9(-7.25,3.775) 10(-7,-3.775) 11(-6.75,3.775) 12(-6.5,-3.775) 13(-6.25,3.775) 14(-6,-3.775) 15(-5.75,3.775) 16(-5.5,-3.775) 17(-5.25,3.775) 18(-5,-3.775) 19(-4.75,3.775) 20(-4.5,-3.775) 21(-4.25,3.775) 22(-4,-3.775) 23(-3.75,3.775) 24(-3.5,-3.775) 25(-3.25,3.775) 26(-3,-3.775) 27(-2.75,3.775) 28(-2.5,-3.775) 29(-2.25,3.775) 30(-2,-3.775) 31(-1.75,3.775) 32(-1.5,-3.775) 33(-1.25,3.775) 34(-1,-3.775) 35(-0.75,3.775) 36(-0.5,-3.775) 37(-0.25,3.775) 38(0,-3.775) 39(0.25,3.775) 40(0.5,-3.775) 41(0.75,3.775) 42(1,-3.775) 43(1.25,3.775) 44(1.5,-3.775) 45(1.75,3.775) 46(2,-3.775) 47(2.25,3.775) 48(2.5,-3.775) 49(2.75,3.775) 50(3,-3.775) 51(3.25,3.775) 52(3.5,-3.775) 53(3.75,3.775) 54(4,-3.775) 55(4.25,3.775) 56(4.5,-3.775) 57(4.75,3.775) 58(5,-3.775) 67(7.25,3.775) 68(7.5,-3.775) 69(7.75,3.775) 70(8,-3.775) 71(8.25,3.775) 72(8.5,-3.775) 73(8.75,3.775) 74(9,-3.775) 75(9.25,3.775)
  rect 1.3x2.75 smd mask+0.05: 76(-10.35,3) 77(10.35,3)
  silkscreen extent -10.9,-82.5 10.9,3.58, body extent -10.9,-4.05 10.95,4.1, height 4.08
"Mark Point_circle" [mm]
  round 1 smd paste-0.5 mask+1: 0(0,0)
  01 TOP pour cut-out: 179 vertices and 0 holes, not listed, extent -1.5,-1.5 1.5,1.5
"MIC 2*5" [mm]
  rect 1.2x1.2 hole 0.6 mask+0.05: 1(-1,0)
  round 1.2 hole 0.6 mask+0.05: 2(1,0)
  silkscreen extent -4.13,-3.1 3.1,3.1
N-HOLE_2.0MM [mm]
  round 2 hole 2 unplated mask+0.05: 0(0,0)
PH2.0_2P_V [mm]
  rect 1.3x1.3 hole 0.9 mask+0.05: 1(-1,0)
  round 1.3 hole 0.9 mask+0.05: 2(1,0)
  silkscreen extent -3.13,-3.03 3.13,1.92, body extent -3,-2.9 3,1.8, height 6.1
PJ3930-8P [mm]
  rect 1.4x2.3 smd mask+0.05: 1(-3.5,-3.375) 2(-0.5,-3.375) 3(2.35,-3.375) 4(4.6,-3.375) 5(2.5,3.375) 6(0.25,3.375) 7(-2.6,3.375) 8(-4.35,3.375)
  round 1.2 hole 1.2 unplated mask+0.051: 8(-4,0) 9(3,0)
  silkscreen extent -7.5,-3.05 7,3.05, body extent -7.5,-4.2 7,4.2, height 5.3
QFN14_2.5*3.2 [mm]
  rect 0.5x0.25 smd mask+0.05: 1(-1.2,0.75) 2(-1.2,0.25) 3(-1.2,-0.25) 4(-1.2,-0.75) 8(1.2,-0.75) 9(1.2,-0.25) 10(1.2,0.25) 11(1.2,0.75)
  rect 0.25x0.5 smd mask+0.05: 5(-0.5,-1.55) 6(0,-1.55) 7(0.5,-1.55) 12(0.5,1.55) 13(0,1.55) 14(-0.5,1.55)
  rect 1.4x2.1 smd mask+0.05: 15(0,0)
  silkscreen extent -2.15,-1.6 1.3,1.6
QFN16P_MP8765 [mm] "QFN, 14-Leads, Body 3.00x3.00mm, Pitch 0.40mm/0.80mm, Thermal Pad 0.00x0.90mm, IPC Medium Density"
  oval 1.1x0.2 smd mask+0.05: 1(-1.25,0.525) 2(-1.25,-0.175) 9(1.25,-0.525) 9(1.25,0.175)
  oval 0.2x0.7 smd mask+0.05: 3(-0.8,-1.45) 4(-0.4,-1.45) 5(0,-1.45) 6(0.4,-1.45) 7(0.8,-1.45) 10(0.8,1.45) 11(0.4,1.45) 12(0,1.45) 13(-0.4,1.45) 14(-0.8,1.45)
  oval 0.65x0.2 smd mask+0.05: 9(0,0.165) 9(0,-0.435)
  silkscreen extent -2.02,-1.55 1.55,1.55
QFN24_0.5BSC_4.15*4.15 [mil] "QFN24_0P5_4P15SQ_EP2P6"
  oval 34x11 smd mask+2: 1(-77.76,49.21) 2(-77.76,29.53) 3(-77.76,9.84) 4(-77.76,-9.84) 5(-77.76,-29.53) 6(-77.76,-49.21) 13(77.76,-49.21) 14(77.76,-29.53) 15(77.76,-9.84) 16(77.76,9.84) 17(77.76,29.53) 18(77.76,49.21)
  oval 11x34 smd mask+2: 7(-49.21,-77.76) 8(-29.53,-77.76) 9(-9.84,-77.76) 10(9.84,-77.76) 11(29.53,-77.76) 12(49.21,-77.76) 19(49.21,77.76) 20(29.53,77.76) 21(9.84,77.76) 22(-9.84,77.76) 23(-29.53,77.76) 24(-49.21,77.76)
  rect 102x102 smd mask+2: 25(0,0)
  silkscreen extent -93,-89 89,89
QFN28P_0.5BSC_5*5_H [mm]
  oval 1x0.25 smd mask+0.05: 1(-2.5,1.5) 2(-2.5,1) 3(-2.5,0.5) 4(-2.5,0) 5(-2.5,-0.5) 6(-2.5,-1) 7(-2.5,-1.5) 15(2.5,-1.5) 16(2.5,-1) 17(2.5,-0.5) 18(2.5,0) 19(2.5,0.5) 20(2.5,1) 21(2.5,1.5)
  oval 0.25x1 smd mask+0.05: 8(-1.5,-2.5) 9(-1,-2.5) 10(-0.5,-2.5) 11(0,-2.5) 12(0.5,-2.5) 13(1,-2.5) 14(1.5,-2.5) 22(1.5,2.5) 23(1,2.5) 24(0.5,2.5) 25(0,2.5) 26(-0.5,2.5) 27(-1,2.5) 28(-1.5,2.515)
  rect 3.3x3.3 smd mask+0.05: 29(0,0)
  silkscreen extent -3.03,-2.49 2.51,2.51, body extent -2.5,-2.5 2.5,2.5, height 1
QFN32P_0.5BSC_5*5_H_3..65*3.65 [mm] "QFN, 32-Leads, Body 5.00x5.00mm, Pitch 0.50mm, Thermal Pad 3.45x3.45mm, IPC Medium Density"
  oval 0.8x0.25 smd mask+0.05: 1(-2.425,1.75) 2(-2.425,1.25) 3(-2.425,0.75) 4(-2.425,0.25) 5(-2.425,-0.25) 6(-2.425,-0.75) 7(-2.425,-1.25) 8(-2.425,-1.75) 17(2.425,-1.75) 18(2.425,-1.25) 19(2.425,-0.75) 20(2.425,-0.25) 21(2.425,0.25) 22(2.425,0.75) 23(2.425,1.25) 24(2.425,1.75)
  oval 0.25x0.8 smd mask+0.05: 9(-1.75,-2.425) 10(-1.25,-2.425) 11(-0.75,-2.425) 12(-0.25,-2.425) 13(0.25,-2.425) 14(0.75,-2.425) 15(1.25,-2.425) 16(1.75,-2.425) 25(1.75,2.425) 26(1.25,2.425) 27(0.75,2.425) 28(0.25,2.425) 29(-0.25,2.425) 30(-0.75,2.425) 31(-1.25,2.425) 32(-1.75,2.425)
  rect 3.65x3.65 smd mask+0.05: 33(0,0)
  silkscreen extent -3.33,-2.65 2.65,2.65, body extent -2.51,-2.51 2.51,2.51, height 0.9